# Altium PCB PCB.PcbDoc (part 1 of 9)
Units mil, origin at the board's own origin, x right, y up, seen from the top; angles counter-clockwise.
Board outline 4330.71 x 3149.61 mil, 8 copper layers (L1_TOP, L2_GND, L3_SIG, L4_PWR, L5_PWR, L6_SIG, L7_GND, L8_BOT), stack 62.406 mil thick; 660 components, 433 nets, 2602 pads, 1254 vias.
Unrouted connection lines stored in the file: 930.
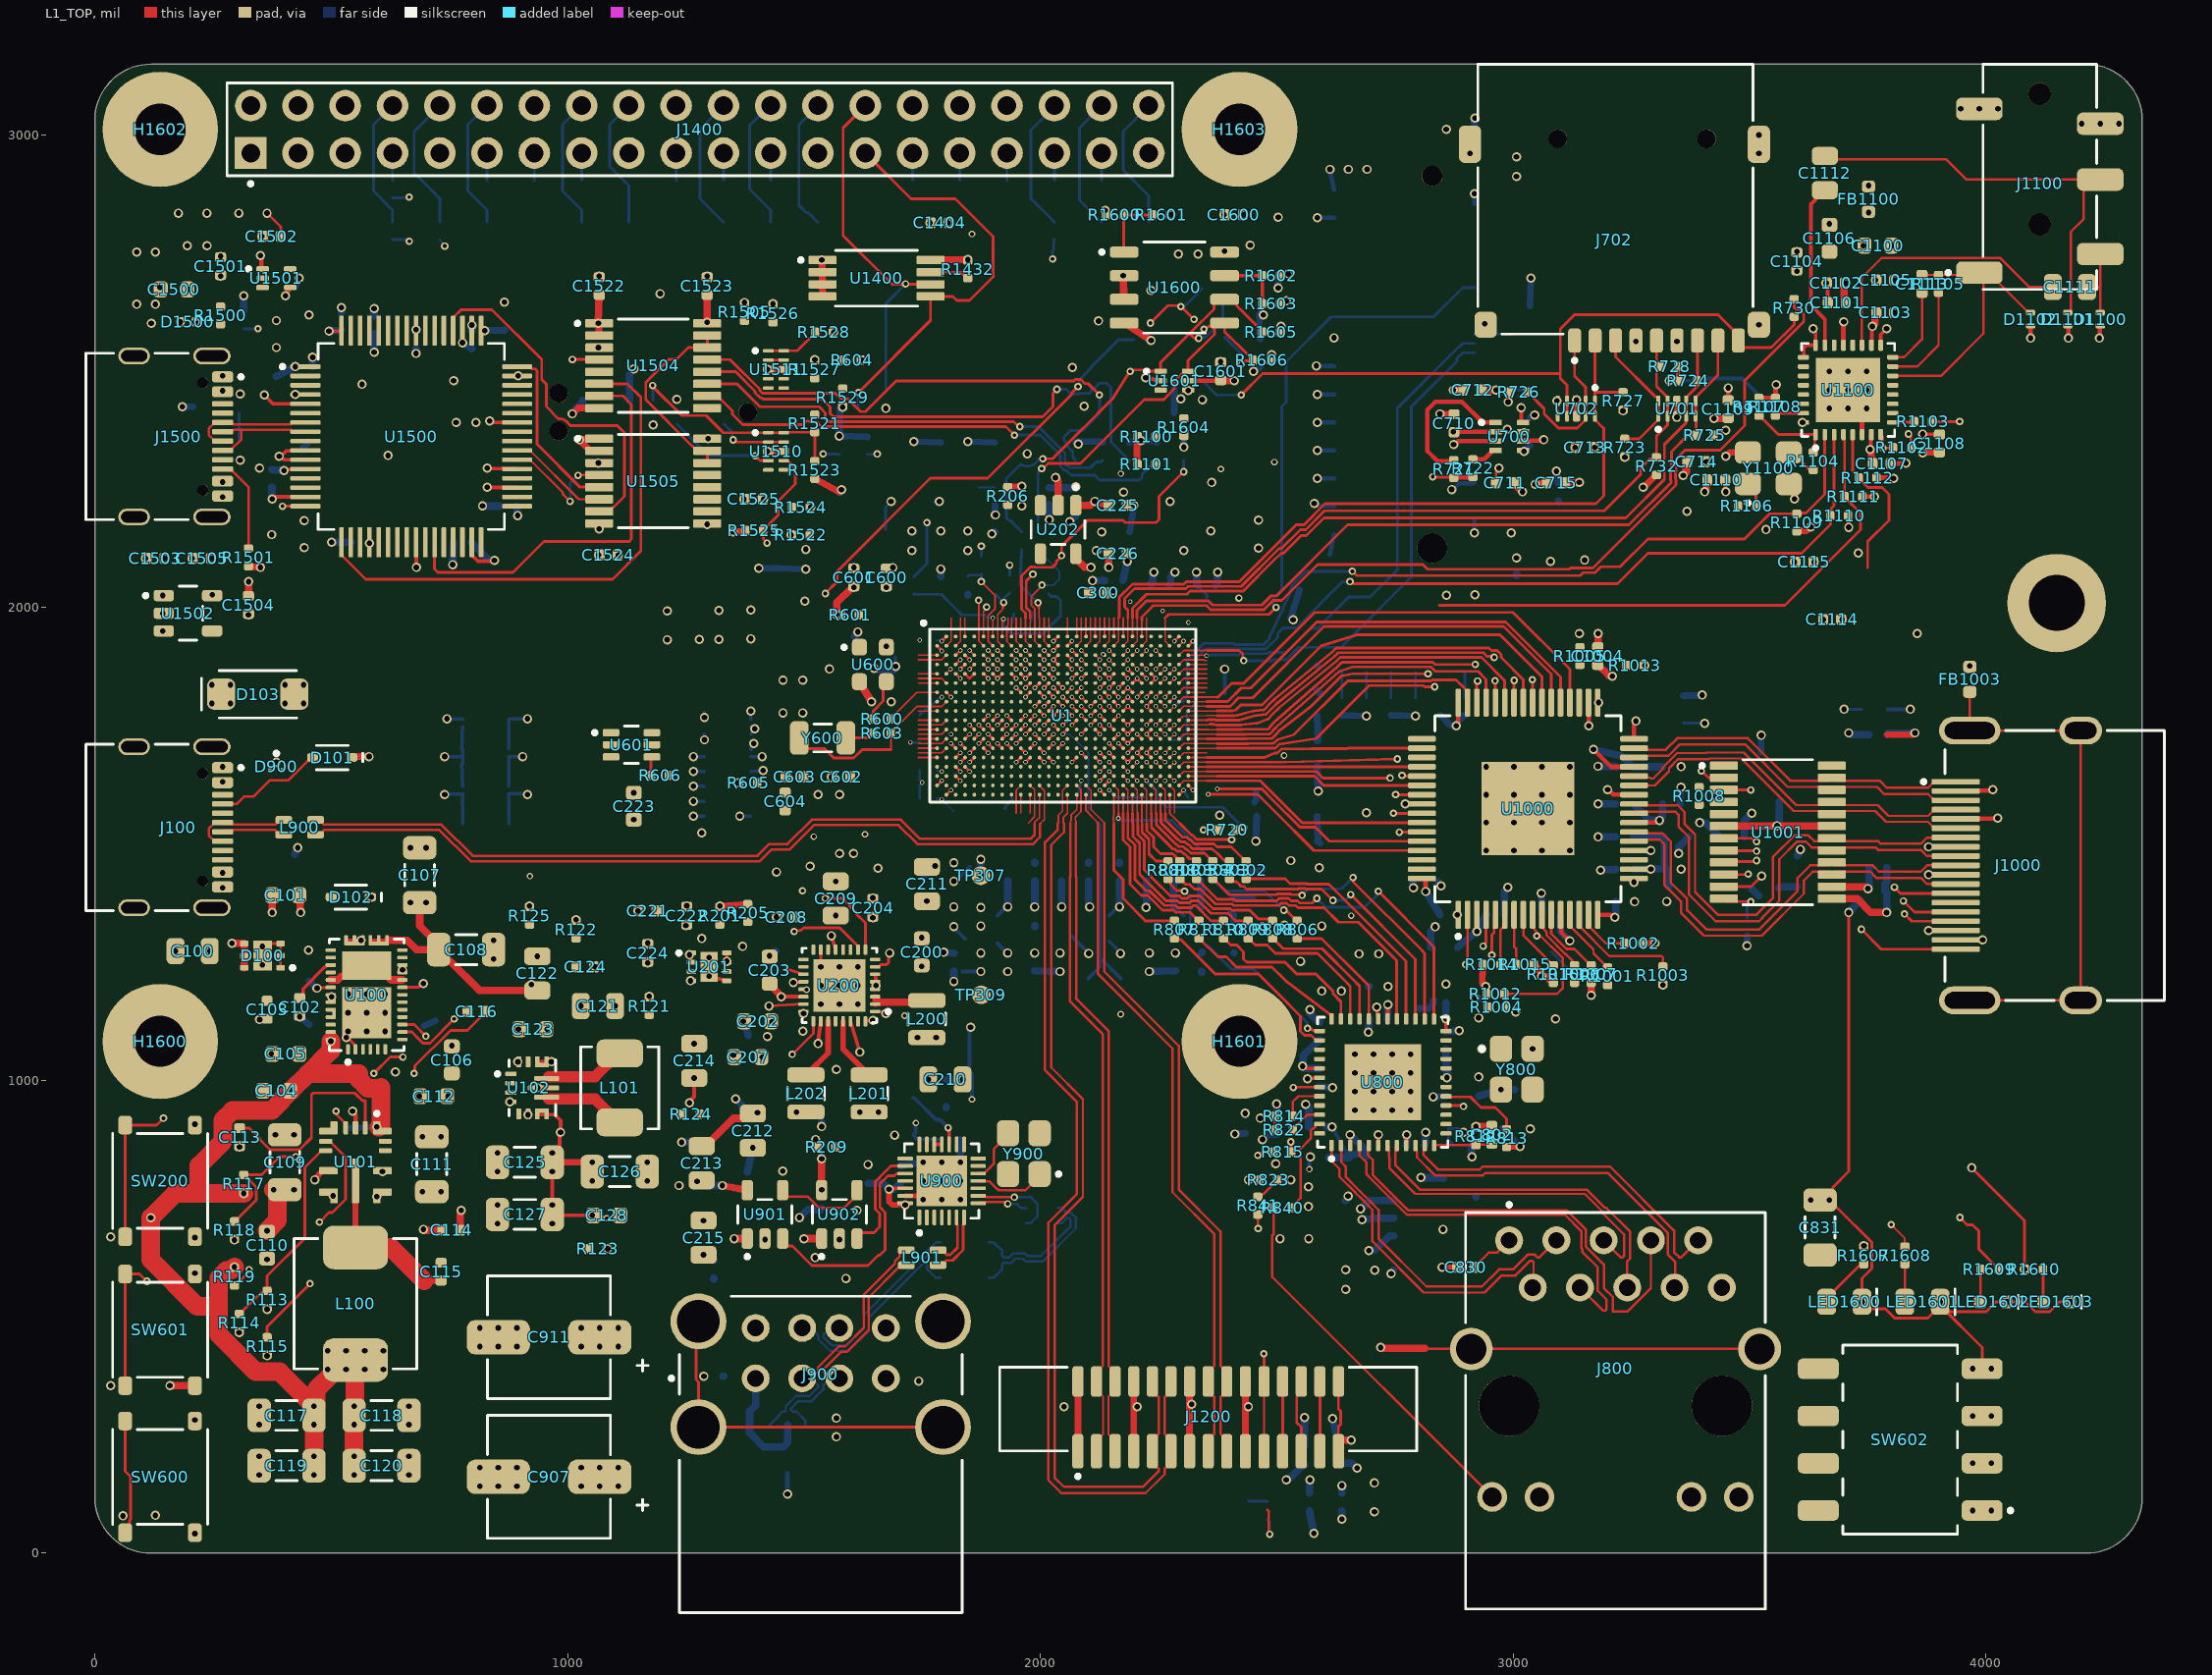
[diagram p0: L1_TOP view]
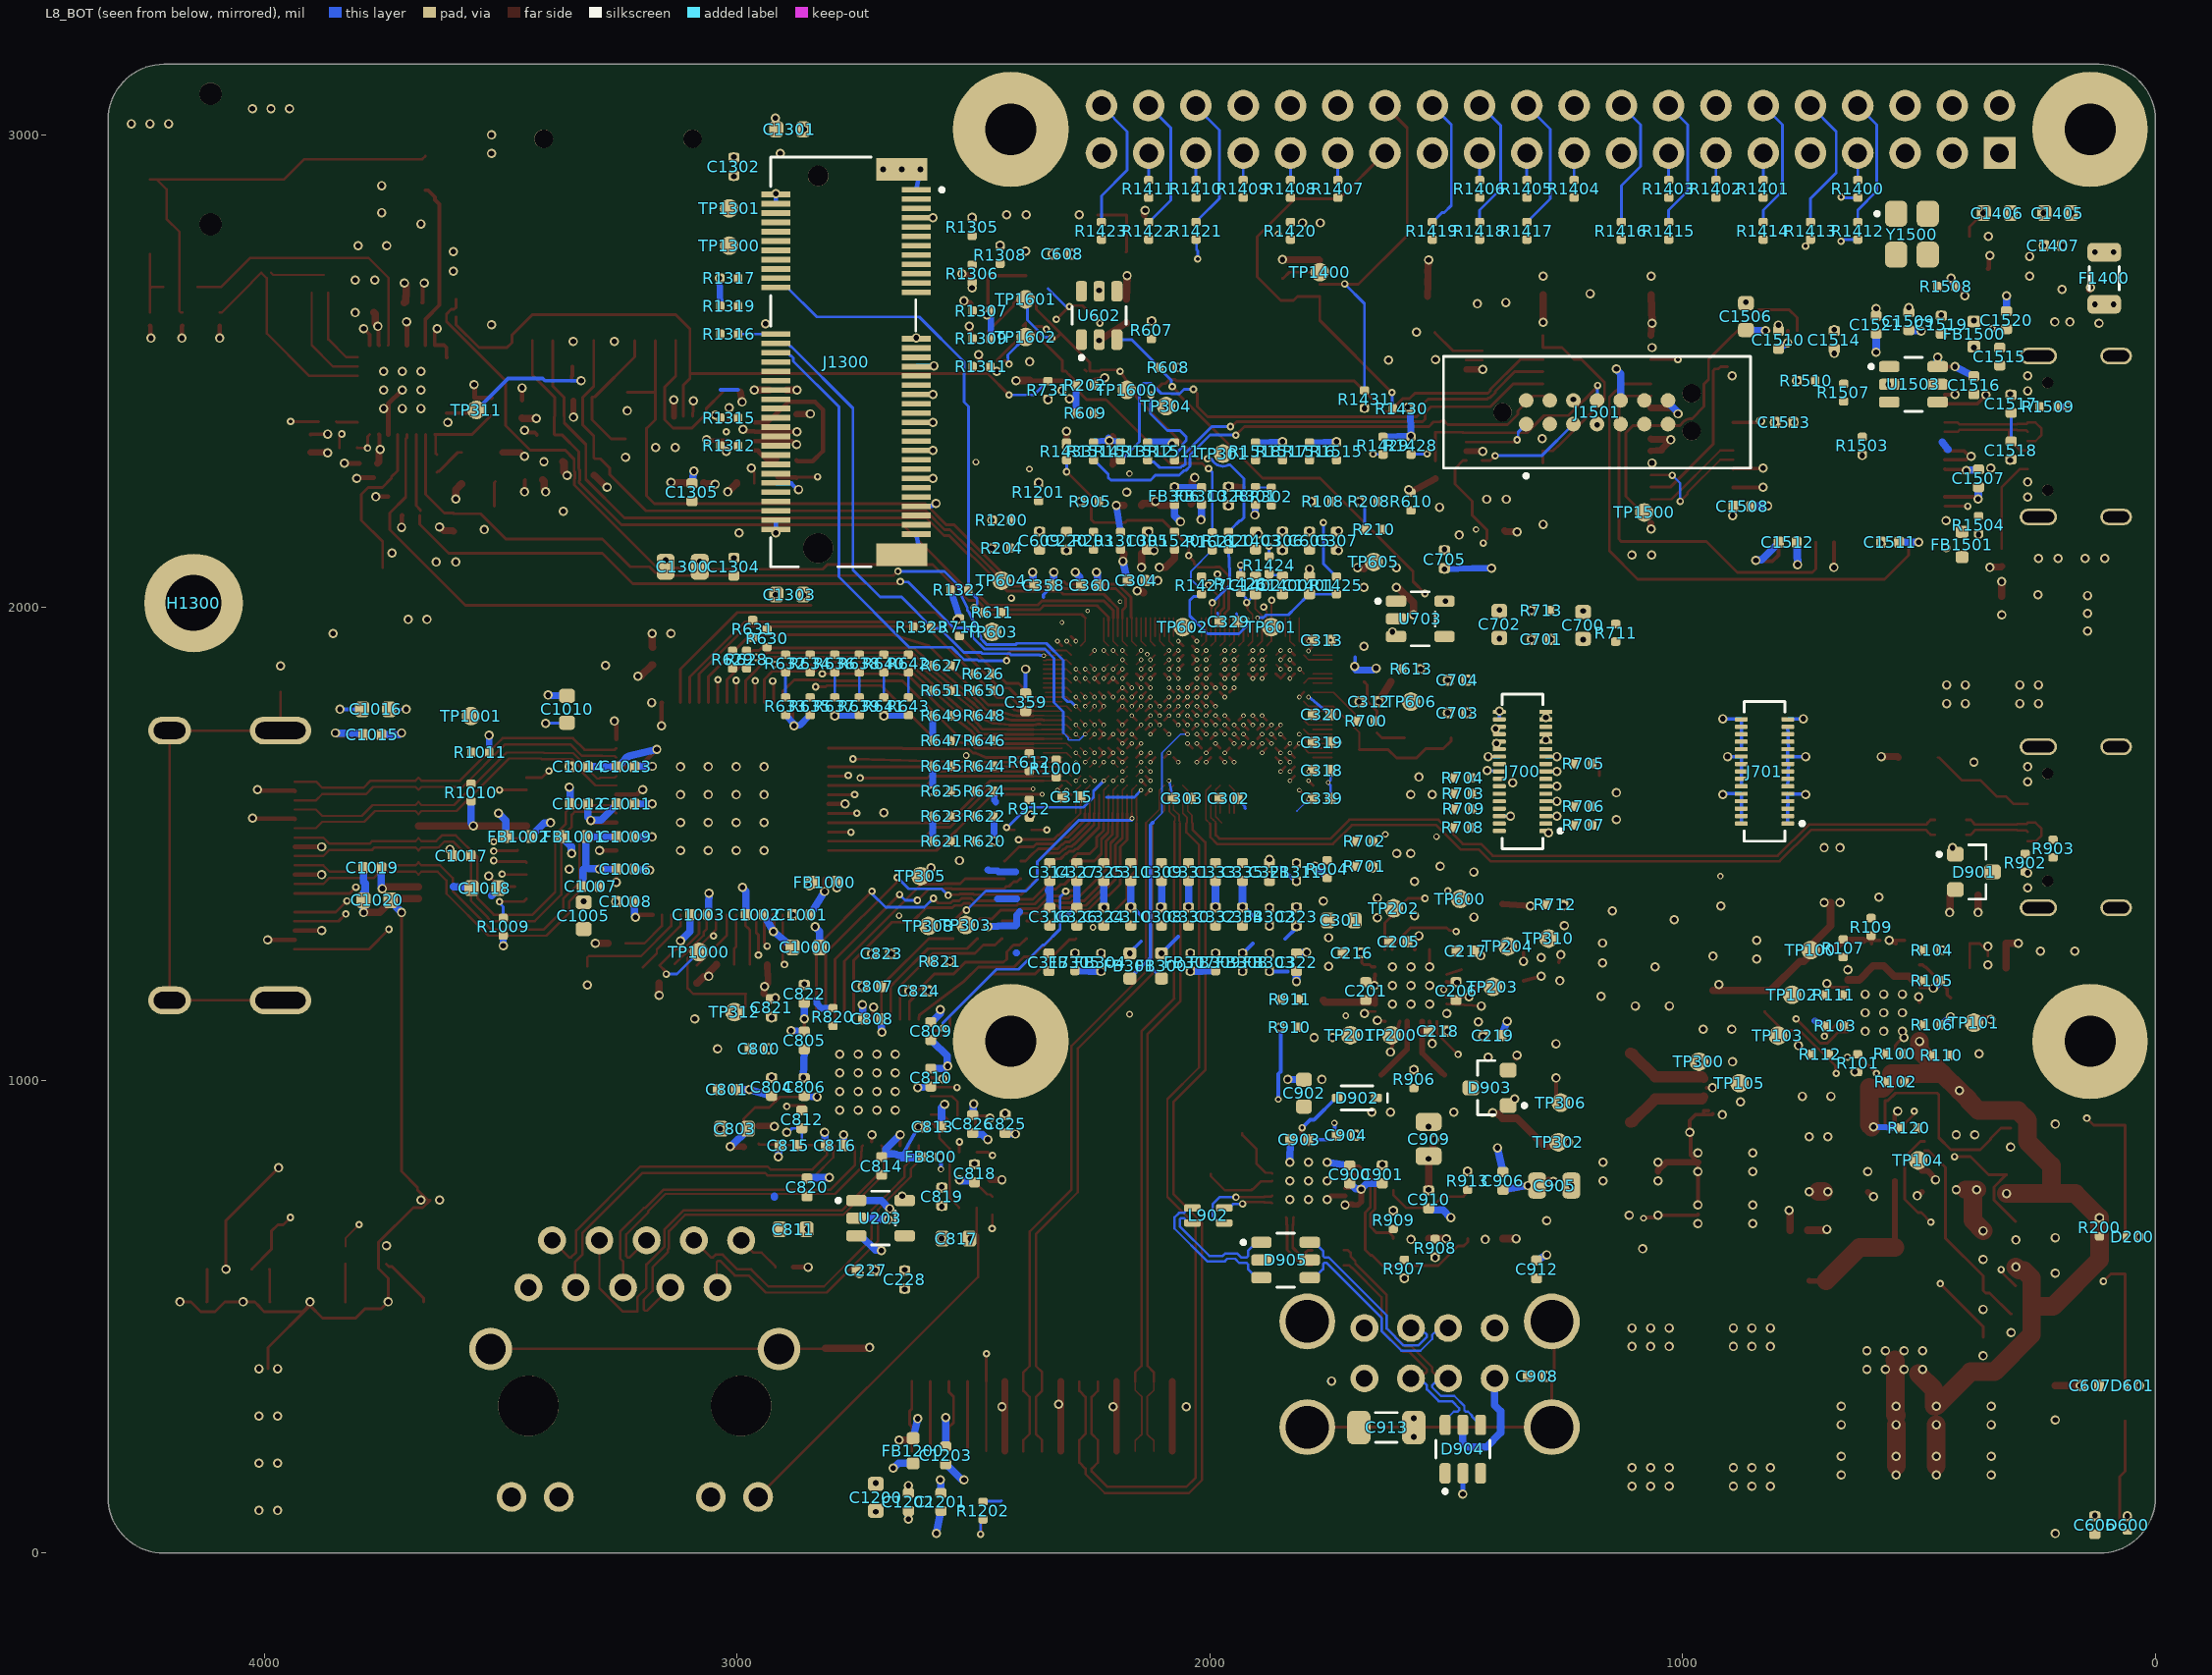
[diagram p1: L8_BOT view, seen from below]
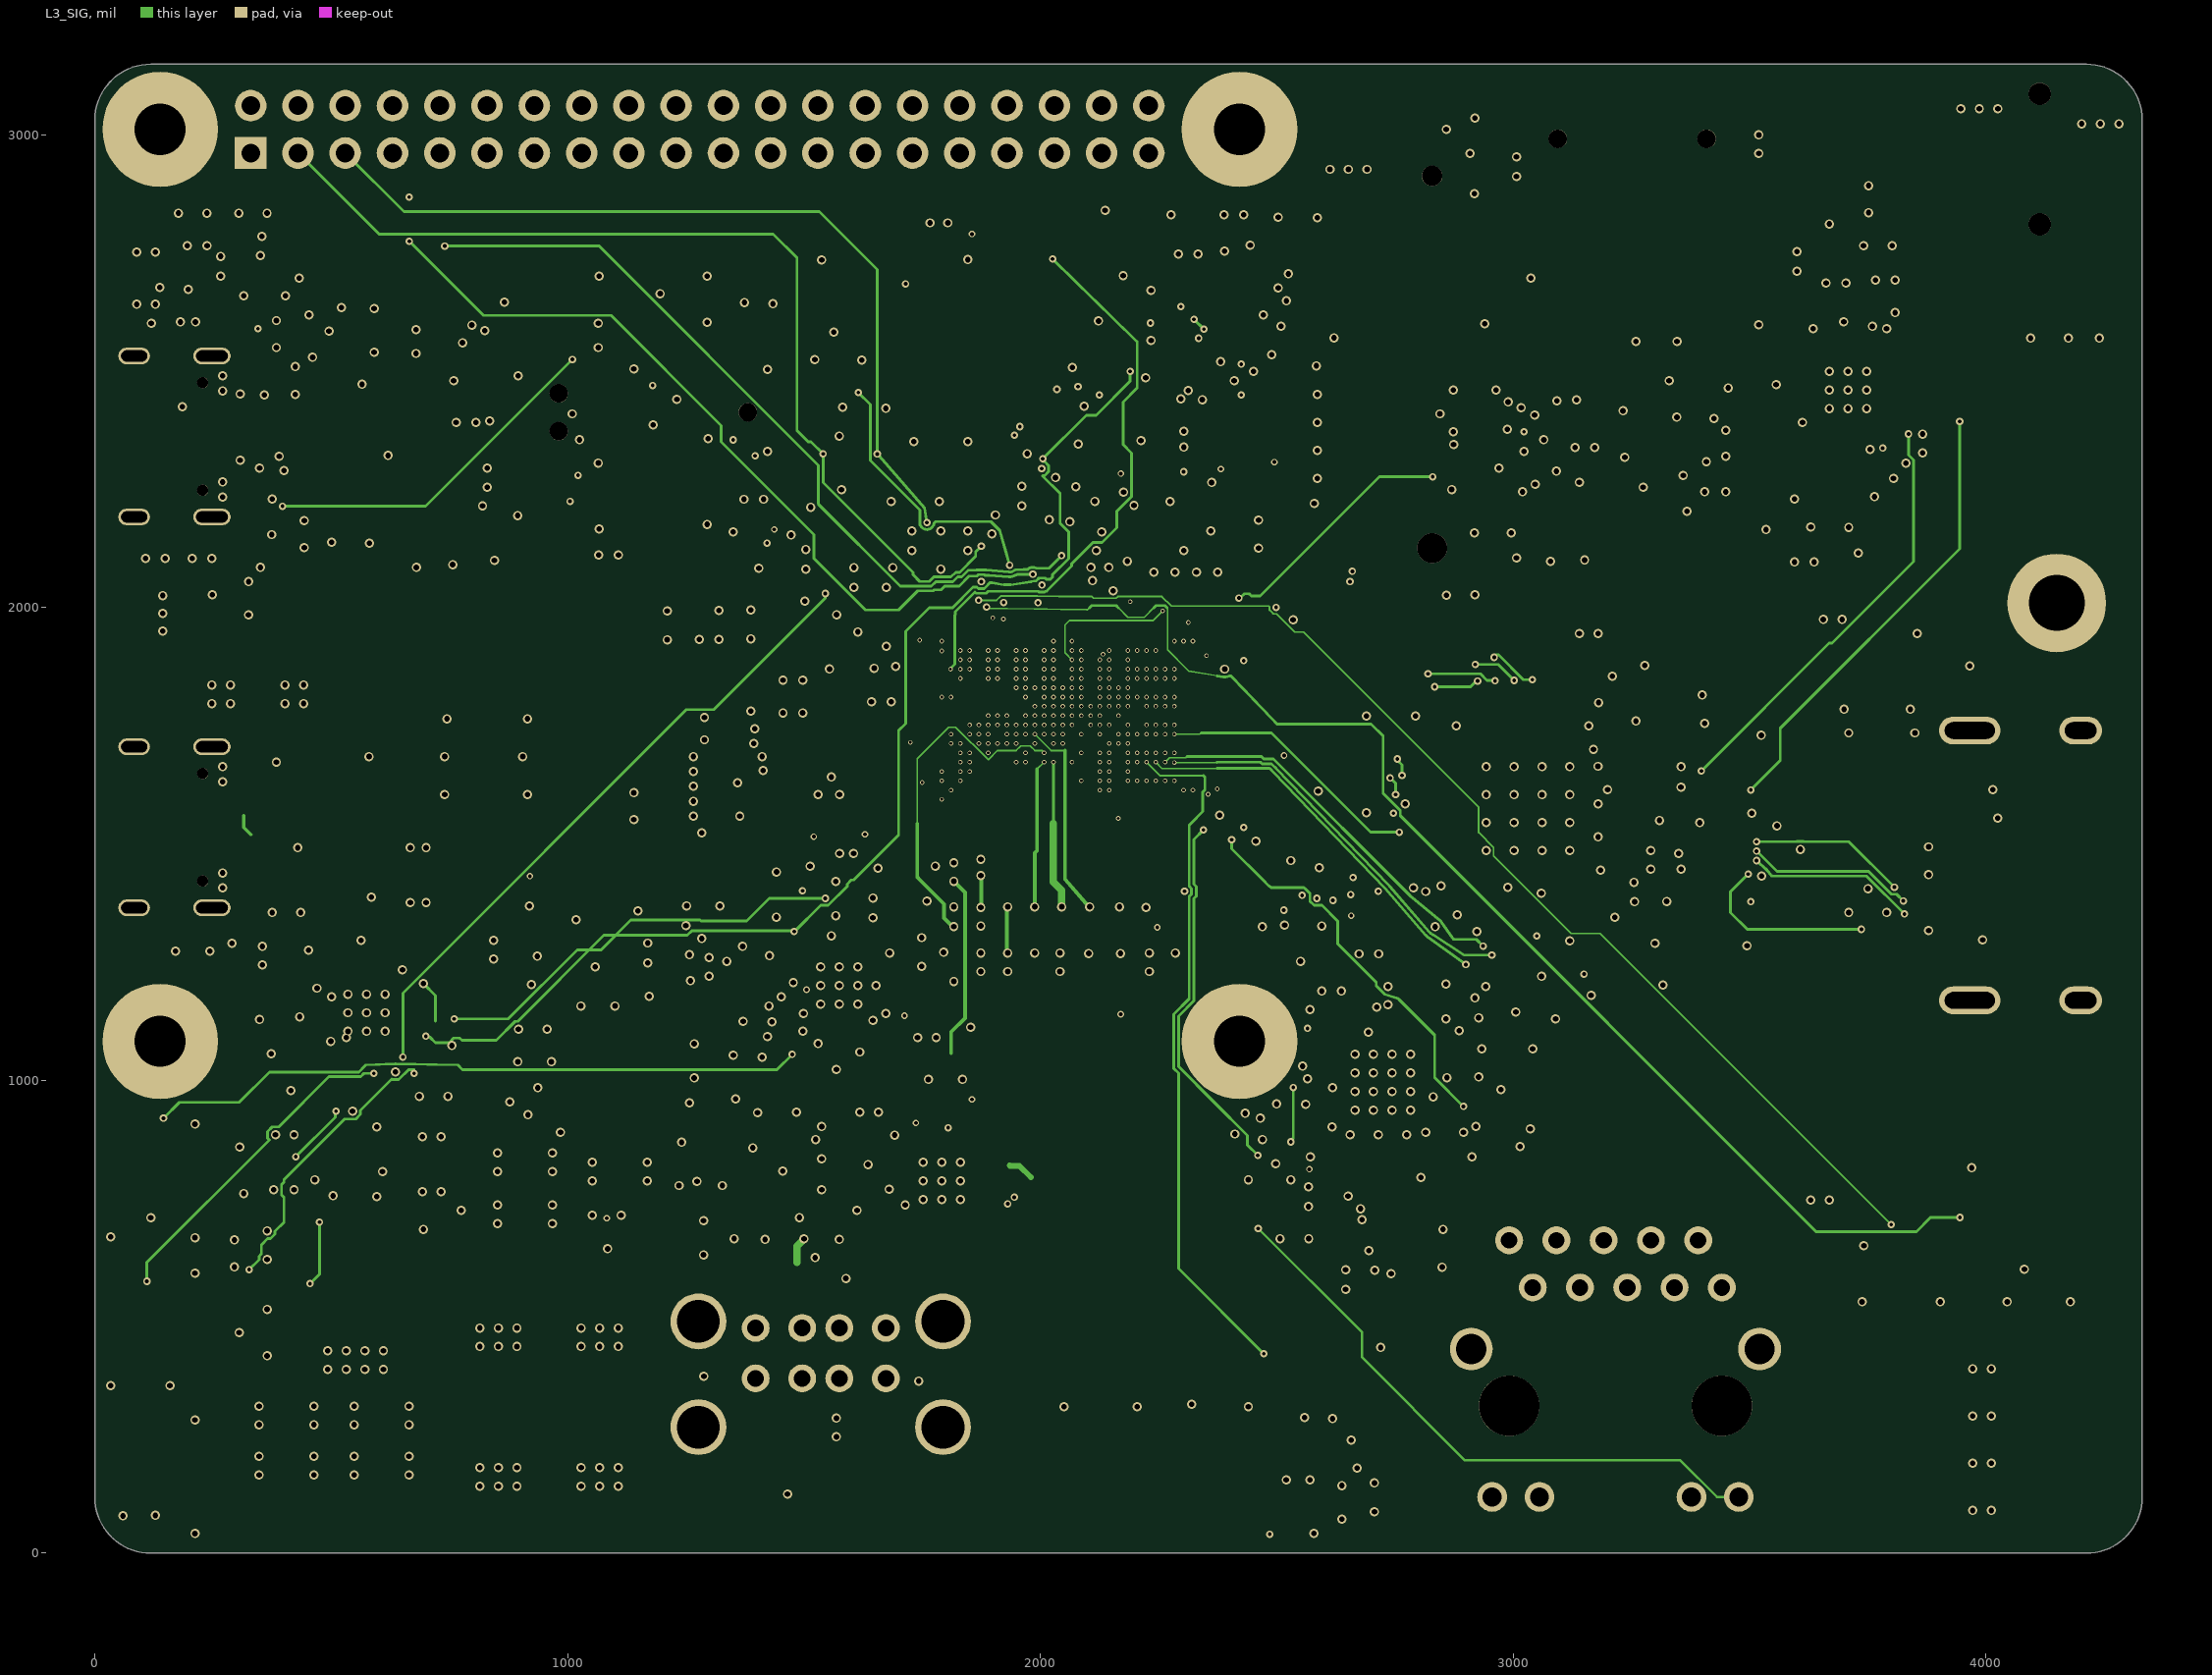
[diagram p2: L3_SIG]
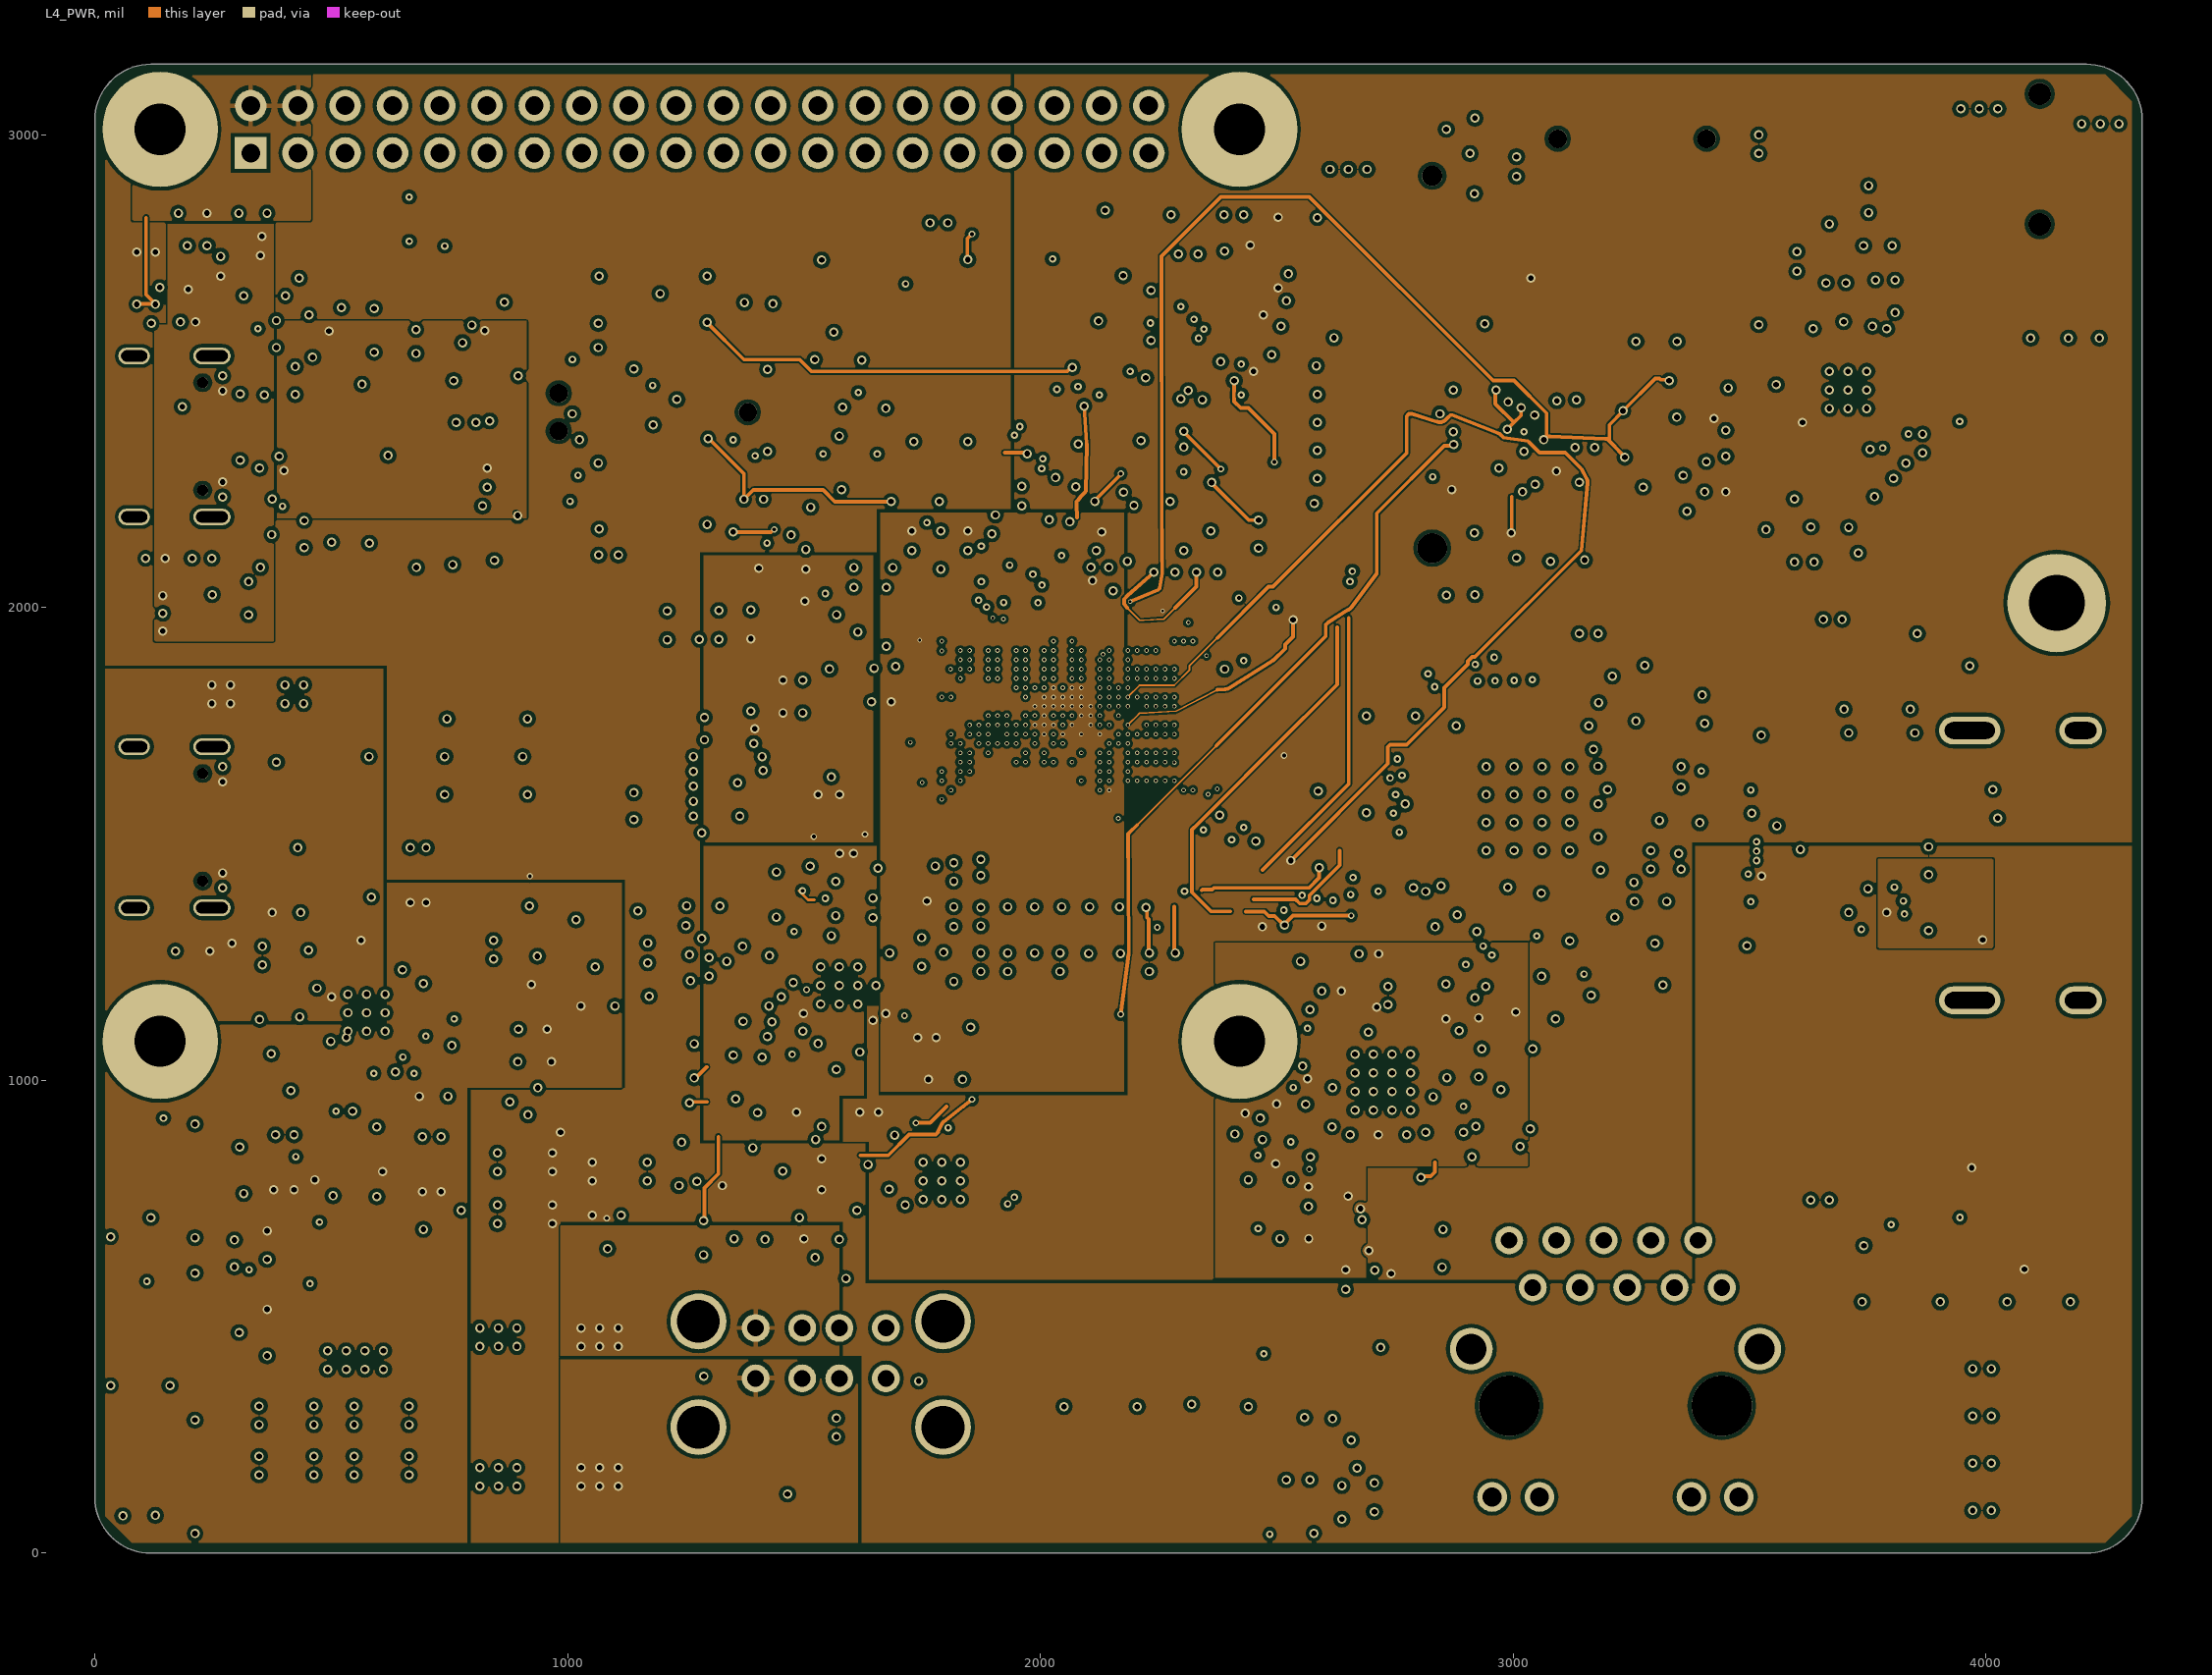
[diagram p3: L4_PWR]
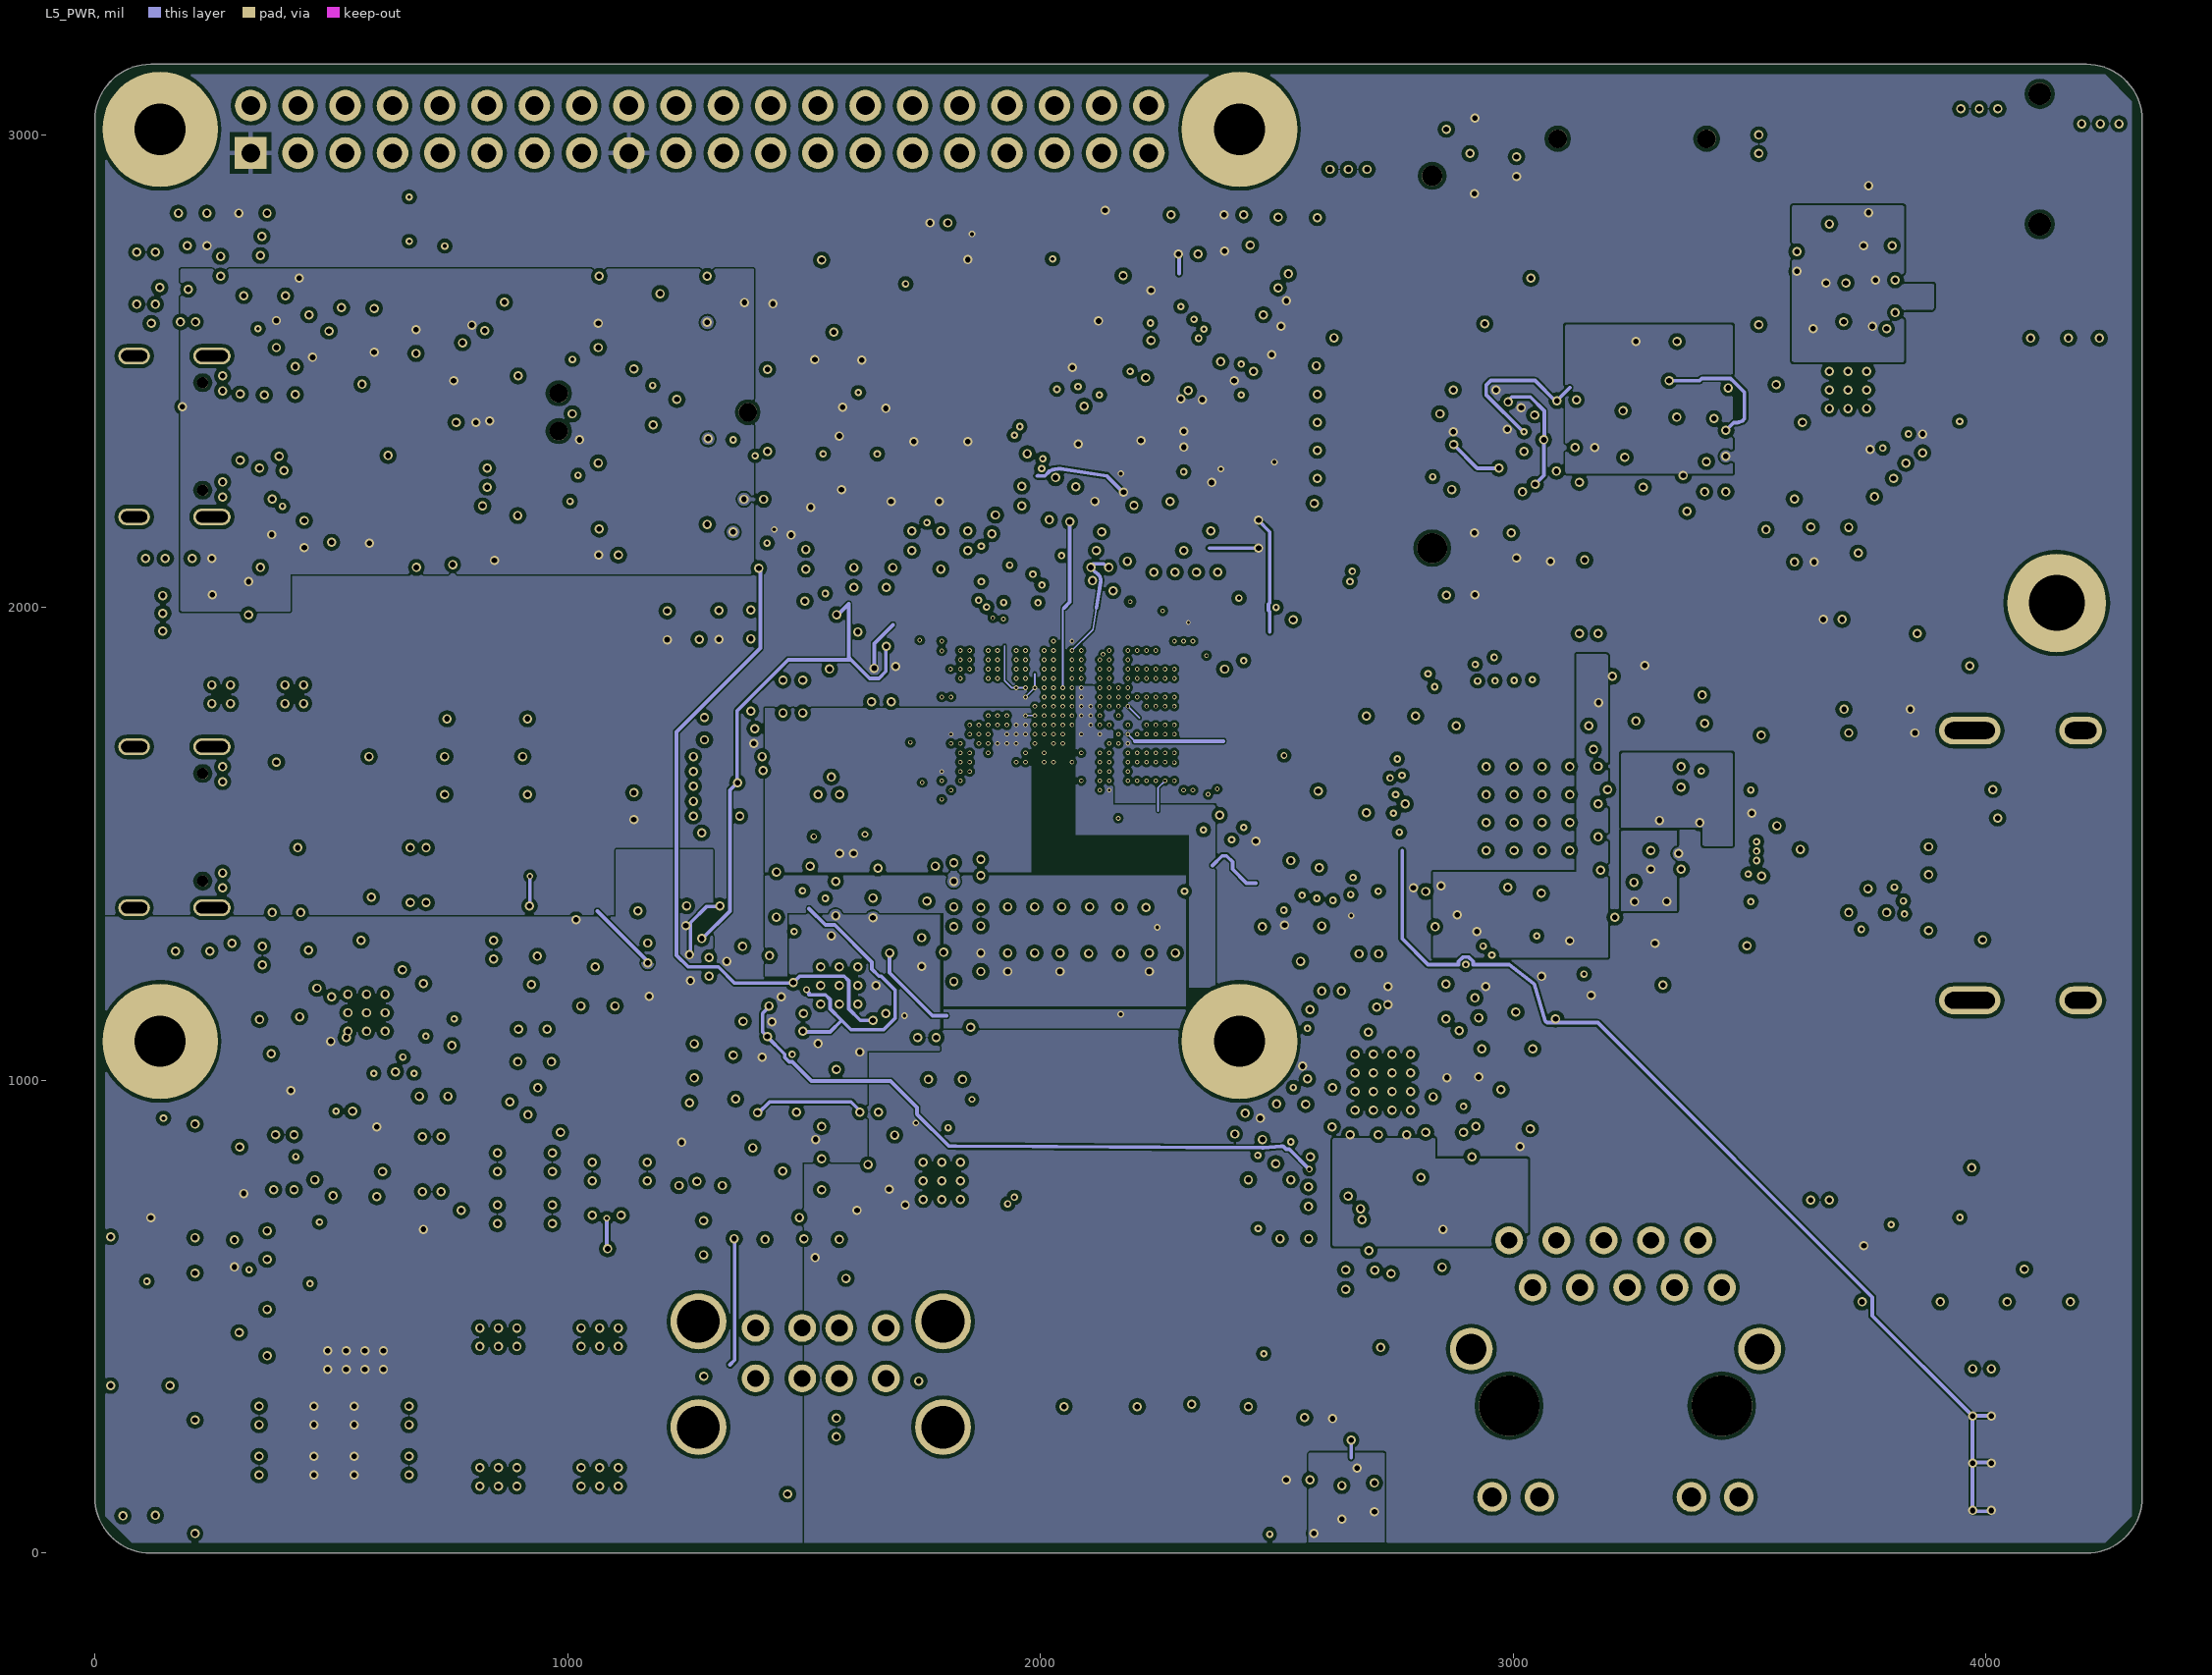
[diagram p4: L5_PWR]
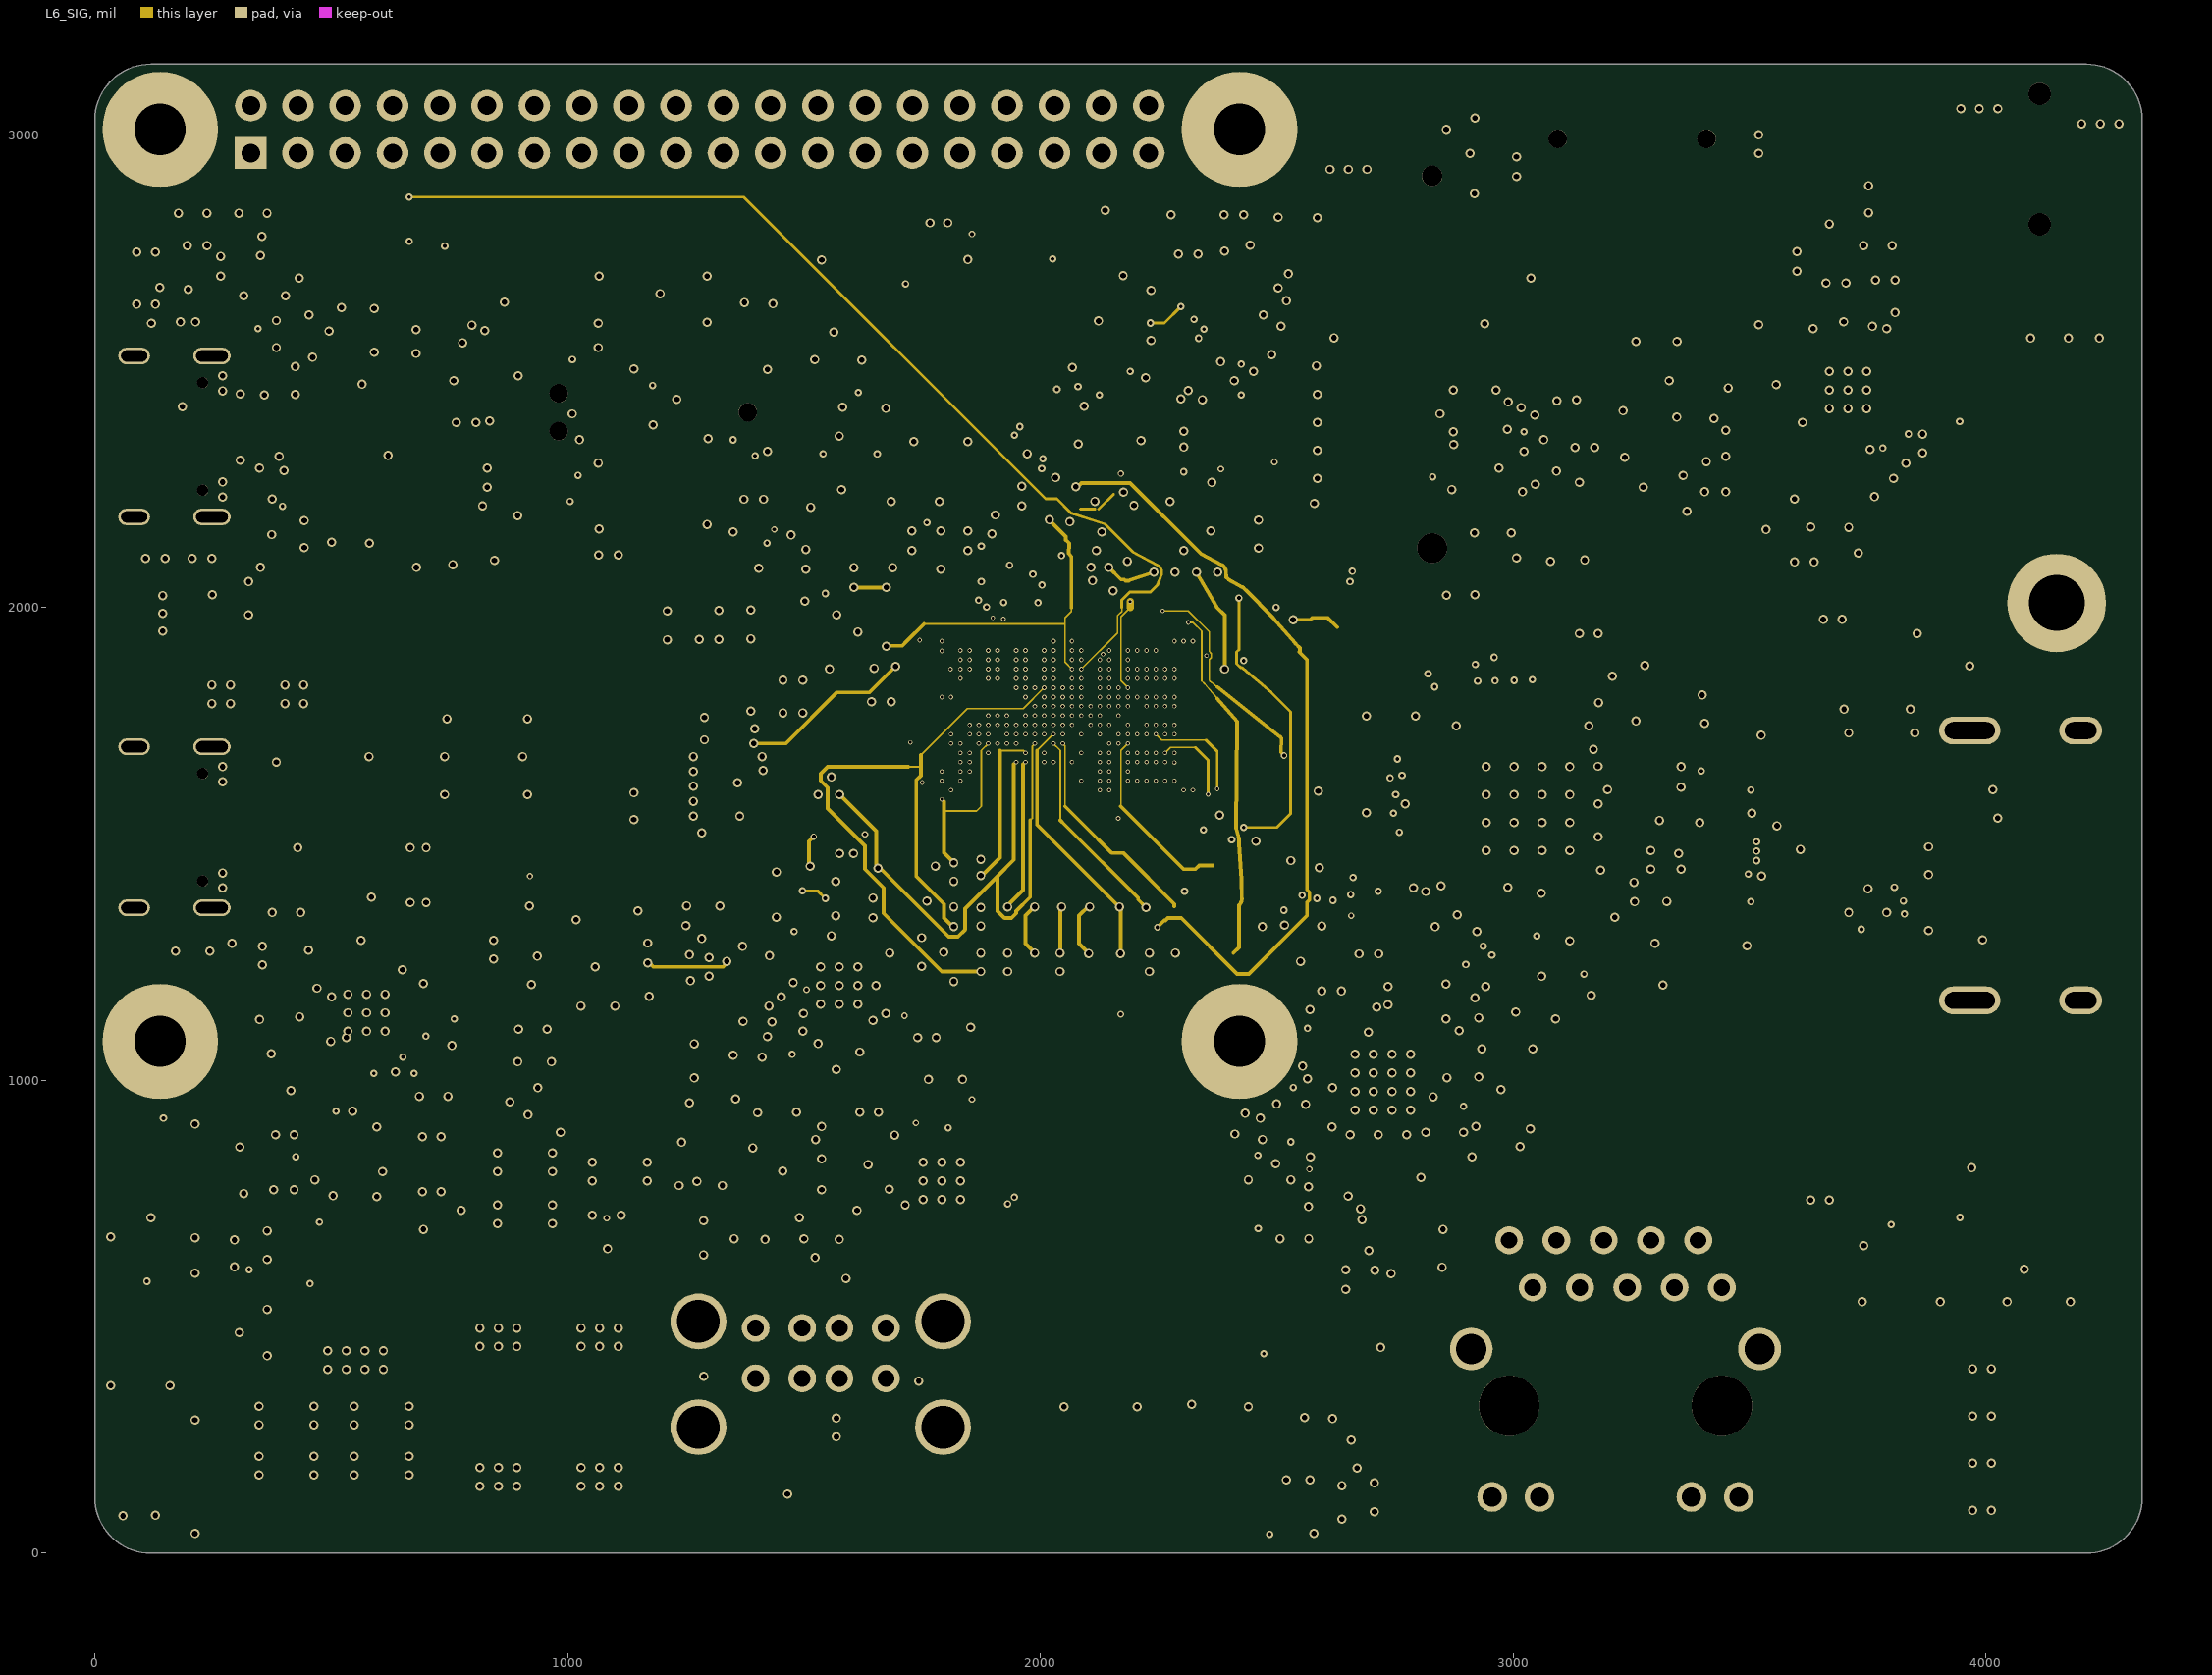
[diagram p5: L6_SIG]

## Layer stack, top to bottom
Top Solder: solder mask 1, Solder Resist, Dk 3.8
L1_TOP: signal copper 1.6
PP 3313 L1-L2: prepreg 3.9134, 3313 RC57%, Dk 4.3
L2_GND: signal copper 0.6
Core L2-L3: dielectric 3.937, FR-4 core H/H, Dk 4.3
L3_SIG: signal copper 0.6
PP 2116x3 L3-L4: prepreg 14.0472, 2116 RC54% x3, Dk 4.2
L4_PWR: signal copper 0.6
Core L4-L5: dielectric 11.811, FR-4 core H/H, Dk 4.3
L5_PWR: signal copper 0.6
PP 2116x3 L5-L6: prepreg 14.0472, 2116 RC54% x3, Dk 4.2
L6_SIG: signal copper 0.6
Core L6-L7: dielectric 3.937, FR-4 core H/H, Dk 4.3
L7_GND: signal copper 0.6
PP 3313 L7-L8: prepreg 3.9134, 3313 RC57%, Dk 4.3
L8_BOT: signal copper 1.6
Bottom Solder: solder mask 1, Solder Resist, Dk 3.8

## Board outline
118.11,0 4212.6,0 ccw(c4212.6,118.11) 4330.71,118.11 4330.71,3031.5 ccw(c4212.6,3031.5) 4212.6,3149.61 118.11,3149.61 ccw(c118.11,3031.5) 0,3031.5 0,118.11 ccw(c118.11,118.11)

## Design rules (kind name [scope] priority, off if disabled: settings)
BoardOutlineClearance Board_Outline [All] p1: gap=11.81 ignorepadtopadclearanceinfootprint=FALSE // APE-SBC setup (gen/pcbsetup.py)
Clearance Clr_InnerPour_SiPVia [InPolygon And (OnLayer('L2_GND') Or OnLayer('L4_PWR') Or OnLayer('L5_PWR') Or OnLayer('L7_GND')) vs IsVia And WithinRoom('U1_SiP')] p1: gap=5.91 ignorepadtopadclearanceinfootprint=FALSE // APE-SBC setup (gen/pcbsetup.py)
Clearance Clr_InnerPour_Hole [InPolygon And (OnLayer('L2_GND') Or OnLayer('L4_PWR') Or OnLayer('L5_PWR') Or OnLayer('L7_GND')) vs IsVia Or IsPad] p2: gap=7.87 ignorepadtopadclearanceinfootprint=FALSE // APE-SBC setup (gen/pcbsetup.py)
Clearance Clr_SiP [WithinRoom('U1_SiP')] p3: gap=3.54 ignorepadtopadclearanceinfootprint=FALSE // APE-SBC setup (gen/pcbsetup.py)
Clearance Clr_HS_Escape [WithinRoom('U1_Escape') And IsTrack vs IsTrack] p4: gap=3.94 ignorepadtopadclearanceinfootprint=FALSE // APE-SBC setup (gen/pcbsetup.py)
Clearance Clr_HDMI_Escape [WithinRoom('HDMI_Escape') And InDifferentialPairClass('HDMI_TMDS') And IsTrack vs IsTrack] p5: gap=3.94 ignorepadtopadclearanceinfootprint=FALSE // APE-SBC setup (gen/pcbsetup.py)
Clearance Clr_HDMI_Escape_Other [WithinRoom('HDMI_Escape') And IsTrack vs InDifferentialPairClass('HDMI_TMDS') And IsTrack] p6: gap=3.94 ignorepadtopadclearanceinfootprint=FALSE // APE-SBC setup (gen/pcbsetup.py)
Clearance Clr_ETH_Escape [WithinRoom('U800_Escape') And InDifferentialPairClass('ETH_MDI') And IsTrack vs IsTrack] p7: gap=3.94 ignorepadtopadclearanceinfootprint=FALSE // APE-SBC setup (gen/pcbsetup.py)
Clearance Clr_ETH_Escape_Other [WithinRoom('U800_Escape') And IsTrack vs InDifferentialPairClass('ETH_MDI') And IsTrack] p8: gap=3.94 ignorepadtopadclearanceinfootprint=FALSE // APE-SBC setup (gen/pcbsetup.py)
Clearance Clr_USBDBG_Escape [WithinRoom('J1500_Escape') And InDifferentialPairClass('USB_DBG') And IsTrack vs IsTrack] p9: gap=3.94 ignorepadtopadclearanceinfootprint=FALSE // APE-SBC setup (gen/pcbsetup.py)
Clearance Clr_USBDBG_Escape_Other [WithinRoom('J1500_Escape') And IsTrack vs InDifferentialPairClass('USB_DBG') And IsTrack] p10: gap=3.94 ignorepadtopadclearanceinfootprint=FALSE // APE-SBC setup (gen/pcbsetup.py)
Clearance Clr_USB1_Escape [WithinRoom('U900_Escape') And InDifferentialPairClass('USB1') And IsTrack vs IsTrack] p11: gap=3.94 ignorepadtopadclearanceinfootprint=FALSE // APE-SBC setup (gen/pcbsetup.py)
Clearance Clr_USB1_Escape_Other [WithinRoom('U900_Escape') And IsTrack vs InDifferentialPairClass('USB1') And IsTrack] p12: gap=3.94 ignorepadtopadclearanceinfootprint=FALSE // APE-SBC setup (gen/pcbsetup.py)
Clearance Clr_HS_DP_Periodic [InNetClass('HS_CLK') And IsTrack vs (InDifferentialPairClass('USB0') Or InDifferentialPairClass('USB1') Or InDifferentialPairClass('USB_DBG') Or InDifferentialPairClass('ETH_MDI') Or InDifferentialPairClass('HDMI_TMDS') Or InDifferentialPairClass('CSI')) And IsTrack] p13: gap=50 ignorepadtopadclearanceinfootprint=FALSE // APE-SBC setup (gen/pcbsetup.py)
Clearance Clr_HS_USB0 [InDifferentialPair('USB0') And IsTrack vs (Not InDifferentialPair('USB0')) And IsTrack And (Not InNet('GND'))] p14: gap=30 ignorepadtopadclearanceinfootprint=FALSE // APE-SBC setup (gen/pcbsetup.py)
Clearance Clr_HS_USBC1 [InDifferentialPair('USBC1') And IsTrack vs (Not InDifferentialPair('USBC1')) And IsTrack And (Not InNet('GND'))] p15: gap=30 ignorepadtopadclearanceinfootprint=FALSE // APE-SBC setup (gen/pcbsetup.py)
Clearance Clr_HS_USB1 [InDifferentialPair('USB1') And IsTrack vs (Not InDifferentialPair('USB1')) And IsTrack And (Not InNet('GND'))] p16: gap=30 ignorepadtopadclearanceinfootprint=FALSE // APE-SBC setup (gen/pcbsetup.py)
Clearance Clr_HS_HUB_P1 [InDifferentialPair('HUB_P1') And IsTrack vs (Not InDifferentialPair('HUB_P1')) And IsTrack And (Not InNet('GND'))] p17: gap=30 ignorepadtopadclearanceinfootprint=FALSE // APE-SBC setup (gen/pcbsetup.py)
Clearance Clr_HS_HUB_P2 [InDifferentialPair('HUB_P2') And IsTrack vs (Not InDifferentialPair('HUB_P2')) And IsTrack And (Not InNet('GND'))] p18: gap=30 ignorepadtopadclearanceinfootprint=FALSE // APE-SBC setup (gen/pcbsetup.py)
Clearance Clr_HS_USBA1 [InDifferentialPair('USBA1') And IsTrack vs (Not InDifferentialPair('USBA1')) And IsTrack And (Not InNet('GND'))] p19: gap=30 ignorepadtopadclearanceinfootprint=FALSE // APE-SBC setup (gen/pcbsetup.py)
Clearance Clr_HS_USBA2 [InDifferentialPair('USBA2') And IsTrack vs (Not InDifferentialPair('USBA2')) And IsTrack And (Not InNet('GND'))] p20: gap=30 ignorepadtopadclearanceinfootprint=FALSE // APE-SBC setup (gen/pcbsetup.py)
Clearance Clr_HS_DBG_USB [InDifferentialPair('DBG_USB') And IsTrack vs (Not InDifferentialPair('DBG_USB')) And IsTrack And (Not InNet('GND'))] p21: gap=30 ignorepadtopadclearanceinfootprint=FALSE // APE-SBC setup (gen/pcbsetup.py)
Clearance Clr_HS_ETH_MDI0 [InDifferentialPair('ETH_MDI0') And IsTrack vs (Not InDifferentialPair('ETH_MDI0')) And IsTrack And (Not InNet('GND'))] p22: gap=30 ignorepadtopadclearanceinfootprint=FALSE // APE-SBC setup (gen/pcbsetup.py)
Clearance Clr_HS_ETH_MDI1 [InDifferentialPair('ETH_MDI1') And IsTrack vs (Not InDifferentialPair('ETH_MDI1')) And IsTrack And (Not InNet('GND'))] p23: gap=30 ignorepadtopadclearanceinfootprint=FALSE // APE-SBC setup (gen/pcbsetup.py)
Clearance Clr_HS_ETH_MDI2 [InDifferentialPair('ETH_MDI2') And IsTrack vs (Not InDifferentialPair('ETH_MDI2')) And IsTrack And (Not InNet('GND'))] p24: gap=30 ignorepadtopadclearanceinfootprint=FALSE // APE-SBC setup (gen/pcbsetup.py)
Clearance Clr_HS_ETH_MDI3 [InDifferentialPair('ETH_MDI3') And IsTrack vs (Not InDifferentialPair('ETH_MDI3')) And IsTrack And (Not InNet('GND'))] p25: gap=30 ignorepadtopadclearanceinfootprint=FALSE // APE-SBC setup (gen/pcbsetup.py)
Clearance Clr_HS_HDMI_TX0 [InDifferentialPair('HDMI_TX0') And IsTrack vs (Not InDifferentialPair('HDMI_TX0')) And IsTrack And (Not InNet('GND'))] p26: gap=30 ignorepadtopadclearanceinfootprint=FALSE // APE-SBC setup (gen/pcbsetup.py)
Clearance Clr_HS_HDMI_TX1 [InDifferentialPair('HDMI_TX1') And IsTrack vs (Not InDifferentialPair('HDMI_TX1')) And IsTrack And (Not InNet('GND'))] p27: gap=30 ignorepadtopadclearanceinfootprint=FALSE // APE-SBC setup (gen/pcbsetup.py)
Clearance Clr_HS_HDMI_TX2 [InDifferentialPair('HDMI_TX2') And IsTrack vs (Not InDifferentialPair('HDMI_TX2')) And IsTrack And (Not InNet('GND'))] p28: gap=30 ignorepadtopadclearanceinfootprint=FALSE // APE-SBC setup (gen/pcbsetup.py)
Clearance Clr_HS_HDMI_TXC [InDifferentialPair('HDMI_TXC') And IsTrack vs (Not InDifferentialPair('HDMI_TXC')) And IsTrack And (Not InNet('GND'))] p29: gap=30 ignorepadtopadclearanceinfootprint=FALSE // APE-SBC setup (gen/pcbsetup.py)
Clearance Clr_HS_CSI_CLK [InDifferentialPair('CSI_CLK') And IsTrack vs (Not InDifferentialPair('CSI_CLK')) And IsTrack And (Not InNet('GND'))] p30: gap=30 ignorepadtopadclearanceinfootprint=FALSE // APE-SBC setup (gen/pcbsetup.py)
Clearance Clr_HS_CSI_D0 [InDifferentialPair('CSI_D0') And IsTrack vs (Not InDifferentialPair('CSI_D0')) And IsTrack And (Not InNet('GND'))] p31: gap=30 ignorepadtopadclearanceinfootprint=FALSE // APE-SBC setup (gen/pcbsetup.py)
Clearance Clr_HS_CSI_D1 [InDifferentialPair('CSI_D1') And IsTrack vs (Not InDifferentialPair('CSI_D1')) And IsTrack And (Not InNet('GND'))] p32: gap=30 ignorepadtopadclearanceinfootprint=FALSE // APE-SBC setup (gen/pcbsetup.py)
Clearance Clr_SMD_SMD [IsSMTPin vs IsSMTPin] p33: gap=5.91 ignorepadtopadclearanceinfootprint=FALSE // APE-SBC setup (gen/pcbsetup.py)
Clearance Clr_Default [All] p34: gap=3.94 ignorepadtopadclearanceinfootprint=FALSE // APE-SBC setup (gen/pcbsetup.py)
DiffPairsRouting DP_90R_USB [InDifferentialPairClass('USB0') Or InDifferentialPairClass('USB1') Or InDifferentialPairClass('USB_DBG')] p1: maxlimit=7.87 minlimit=3.54 mostfreqgap=6 toplayer_minwidth=3.54 toplayer_maxwidth=5.91 toplayer_prefwidth=5.34 midlayer2_minwidth=3.54 midlayer2_maxwidth=5.91 midlayer2_prefwidth=4.65 midlayer5_minwidth=3.54 midlayer5_maxwidth=5.91 midlayer5_prefwidth=4.65 bottomlayer_minwidth=3.54 bottomlayer_maxwidth=5.91 bottomlayer_prefwidth=5.34 impedanceprofiledriven=TRUE impedanceprofileid={7402E617-EB0B-4D09-935C-4EA56E4E449E} impedanceprofilevalue=90.000000 maxuncoupledlength=196.85 // APE-SBC setup (gen/pcbsetup.py)
DiffPairsRouting DP_100R_TMDS [InDifferentialPairClass('HDMI_TMDS')] p2: maxlimit=9.84 minlimit=3.54 mostfreqgap=8 toplayer_minwidth=4.69 toplayer_maxwidth=4.69 toplayer_prefwidth=4.69 midlayer1_minwidth=4.69 midlayer1_maxwidth=4.69 midlayer1_prefwidth=4.69 midlayer2_minwidth=4.69 midlayer2_maxwidth=4.69 midlayer2_prefwidth=4.69 midlayer3_minwidth=4.69 midlayer3_maxwidth=4.69 midlayer3_prefwidth=4.69 midlayer4_minwidth=4.69 midlayer4_maxwidth=4.69 midlayer4_prefwidth=4.69 midlayer5_minwidth=4.69 midlayer5_maxwidth=4.69 midlayer5_prefwidth=4.69 midlayer6_minwidth=4.69 midlayer6_maxwidth=4.69 midlayer6_prefwidth=4.69 bottomlayer_minwidth=4.69 bottomlayer_maxwidth=4.69 bottomlayer_prefwidth=4.69 maxuncoupledlength=196.85 // APE-SBC setup (gen/pcbsetup.py)
DiffPairsRouting DP_100R [InDifferentialPairClass('ETH_MDI') Or InDifferentialPairClass('HDMI_TMDS') Or InDifferentialPairClass('CSI')] p3: maxlimit=9.84 minlimit=3.54 mostfreqgap=8 toplayer_minwidth=3.54 toplayer_maxwidth=5.12 toplayer_prefwidth=4.69 midlayer2_minwidth=3.54 midlayer2_maxwidth=5.12 midlayer2_prefwidth=4.01 midlayer5_minwidth=3.54 midlayer5_maxwidth=5.12 midlayer5_prefwidth=4.01 bottomlayer_minwidth=3.54 bottomlayer_maxwidth=5.12 bottomlayer_prefwidth=4.69 impedanceprofiledriven=TRUE impedanceprofileid={0371FD84-AD0E-46D5-B686-1FE8D4CF1FC4} impedanceprofilevalue=100.000000 maxuncoupledlength=196.85 // APE-SBC setup (gen/pcbsetup.py)
HoleSize Hole_Size [All] p1: absolutevalues=TRUE maxlimit=248.03 minlimit=5.91 maxpercent=80.000 minpercent=20.000 // APE-SBC setup (gen/pcbsetup.py)
HoleToHoleClearance HoleToHole_Pads [IsPad vs IsPad] p1: gap=17.72 allowstackedmicrovias=TRUE // APE-SBC setup (gen/pcbsetup.py)
HoleToHoleClearance HoleToHole [All] p2: gap=7.87 allowstackedmicrovias=TRUE // APE-SBC setup (gen/pcbsetup.py)
Length L_RGMII [InxSignalClass('RGMII_TX') Or InxSignalClass('RGMII_RX')] p1: maxlimit=2000 minlimit=0 // APE-SBC setup (gen/pcbsetup.py)
Length L_MMC0 [InxSignalClass('MMC0')] p2: maxlimit=1574.8 minlimit=419.52 // APE-SBC setup (gen/pcbsetup.py)
Length L_MMC1 [InxSignalClass('MMC1')] p3: maxlimit=7931.24 minlimit=813.22 // APE-SBC setup (gen/pcbsetup.py)
Length L_MMC2 [InxSignalClass('MMC2')] p4: maxlimit=7931.24 minlimit=0 // APE-SBC setup (gen/pcbsetup.py)
Length L_DPI [InxSignalClass('DPI')] p5: maxlimit=2800 minlimit=0 // APE-SBC setup (gen/pcbsetup.py)
Length L_MCASP [InNetClass('HS_MCASP')] p6: maxlimit=6294.63 minlimit=645.41 // APE-SBC setup (gen/pcbsetup.py)
Length L_USB [(InDifferentialPairClass('USB0') Or InDifferentialPairClass('USB1') Or InDifferentialPairClass('USB_DBG'))] p7: maxlimit=12000 minlimit=0 // APE-SBC setup (gen/pcbsetup.py)
Length L_CSI [InDifferentialPairClass('CSI')] p8: maxlimit=10000 minlimit=0 // APE-SBC setup (gen/pcbsetup.py)
Length L_TMDS [InDifferentialPairClass('HDMI_TMDS')] p9: maxlimit=2000 minlimit=0 // APE-SBC setup (gen/pcbsetup.py)
MatchedLengths M_RGMII_TXD [InxSignal('ETH_TD0-PHY_TX_D0_PP1') Or InxSignal('ETH_TD1-PHY_TX_D1_PP1') Or InxSignal('ETH_TD2-PHY_TX_D2_PP1') Or InxSignal('ETH_TD3-PHY_TX_D3_PP1')] p1: tolerance=60 checknetsindiffpair=FALSE checkdiffpairvsdiffpair=TRUE checkxsignals=TRUE checkothers=TRUE // APE-SBC setup (gen/pcbsetup.py)
MatchedLengths M_RGMII_RXD [InxSignal('ETH_RD0-PHY_RX_D0_PP1') Or InxSignal('ETH_RD1-PHY_RX_D1_PP1') Or InxSignal('ETH_RD2-PHY_RX_D2_PP1') Or InxSignal('ETH_RD3-PHY_RX_D3_PP1')] p2: tolerance=60 checknetsindiffpair=FALSE checkdiffpairvsdiffpair=TRUE checkxsignals=TRUE checkothers=TRUE // APE-SBC setup (gen/pcbsetup.py)
MatchedLengths M_RGMII_TX [InxSignalClass('RGMII_TX')] p3: tolerance=286.12 checknetsindiffpair=FALSE checkdiffpairvsdiffpair=TRUE checkxsignals=TRUE checkothers=TRUE // APE-SBC setup (gen/pcbsetup.py)
MatchedLengths M_RGMII_RX [InxSignalClass('RGMII_RX')] p4: tolerance=286.12 checknetsindiffpair=FALSE checkdiffpairvsdiffpair=TRUE checkxsignals=TRUE checkothers=TRUE // APE-SBC setup (gen/pcbsetup.py)
MatchedLengths M_MMC0 [InxSignalClass('MMC0')] p5: tolerance=45.78 checknetsindiffpair=FALSE checkdiffpairvsdiffpair=TRUE checkxsignals=TRUE checkothers=TRUE // APE-SBC setup (gen/pcbsetup.py)
MatchedLengths M_MMC1 [InxSignalClass('MMC1')] p6: tolerance=45.78 checknetsindiffpair=FALSE checkdiffpairvsdiffpair=TRUE checkxsignals=TRUE checkothers=TRUE // APE-SBC setup (gen/pcbsetup.py)
MatchedLengths M_MMC2 [InxSignalClass('MMC2')] p7: tolerance=45.78 checknetsindiffpair=FALSE checkdiffpairvsdiffpair=TRUE checkxsignals=TRUE checkothers=TRUE // APE-SBC setup (gen/pcbsetup.py)
MatchedLengths M_DPI [InxSignalClass('DPI')] p8: tolerance=572.24 checknetsindiffpair=FALSE checkdiffpairvsdiffpair=TRUE checkxsignals=TRUE checkothers=TRUE // APE-SBC setup (gen/pcbsetup.py)
MatchedLengths M_MCASP [InNetClass('HS_MCASP')] p9: tolerance=572.24 checknetsindiffpair=FALSE checkdiffpairvsdiffpair=TRUE checkxsignals=TRUE checkothers=TRUE // APE-SBC setup (gen/pcbsetup.py)
MatchedLengths M_USB0_Pair [InDifferentialPairClass('USB0')] p10: tolerance=25 checknetsindiffpair=TRUE checkdiffpairvsdiffpair=FALSE checkxsignals=FALSE checkothers=FALSE // APE-SBC setup (gen/pcbsetup.py)
MatchedLengths M_USB1_Pair [InDifferentialPairClass('USB1')] p11: tolerance=25 checknetsindiffpair=TRUE checkdiffpairvsdiffpair=FALSE checkxsignals=FALSE checkothers=FALSE // APE-SBC setup (gen/pcbsetup.py)
MatchedLengths M_USB_DBG_Pair [InDifferentialPairClass('USB_DBG')] p12: tolerance=50 checknetsindiffpair=TRUE checkdiffpairvsdiffpair=FALSE checkxsignals=FALSE checkothers=FALSE // APE-SBC setup (gen/pcbsetup.py)
MatchedLengths M_CSI_Pair [InDifferentialPairClass('CSI')] p13: tolerance=45.78 checknetsindiffpair=TRUE checkdiffpairvsdiffpair=FALSE checkxsignals=FALSE checkothers=FALSE // APE-SBC setup (gen/pcbsetup.py)
MatchedLengths M_CSI_Lanes [InDifferentialPairClass('CSI')] p14: tolerance=228.9 checknetsindiffpair=FALSE checkdiffpairvsdiffpair=TRUE checkxsignals=TRUE checkothers=TRUE // APE-SBC setup (gen/pcbsetup.py)
MatchedLengths M_TMDS_Pair [InDifferentialPairClass('HDMI_TMDS')] p15: tolerance=5 checknetsindiffpair=TRUE checkdiffpairvsdiffpair=FALSE checkxsignals=FALSE checkothers=FALSE // APE-SBC setup (gen/pcbsetup.py)
MaximumViaCount V_TMDS [InDifferentialPairClass('HDMI_TMDS')] p1: limit=0 // APE-SBC setup (gen/pcbsetup.py)
MaximumViaCount V_MDI [InDifferentialPairClass('ETH_MDI')] p2: limit=1 // APE-SBC setup (gen/pcbsetup.py)
MaximumViaCount V_CSI [InDifferentialPairClass('CSI')] p3: limit=2 // APE-SBC setup (gen/pcbsetup.py)
MaximumViaCount V_USB_Split [(InDifferentialPairClass('USB0') Or InDifferentialPairClass('USB1'))] p4: limit=2 // APE-SBC setup (gen/pcbsetup.py)
MaximumViaCount V_USB_DBG [InDifferentialPairClass('USB_DBG')] p5: limit=4 // APE-SBC setup (gen/pcbsetup.py)
MinimumAnnularRing Ring_Via [IsVia] p1: minimumring=1.97 // APE-SBC setup (gen/pcbsetup.py)
MinimumAnnularRing Ring_PTH [IsPad] p2: minimumring=5.91 // APE-SBC setup (gen/pcbsetup.py)
MinimumSolderMaskSliver Mask_Sliver [All] p1: minsoldermaskwidth=3.94 // APE-SBC setup (gen/pcbsetup.py)
PasteMaskExpansion Paste_Windowed [HasFootprintPad('VQFN32_RHB_5X5','33') Or HasFootprintPad('VQFN48_RGZ_7X7','49') Or HasFootprintPad('QFN28_4X4_P0.4','29') Or HasFootprintPad('VQFN32_RSM_4X4','33') Or HasFootprintPad('WQFN38_REF_4X6','39') Or HasFootprintPad('WQFN38_REF_4X6','40') Or HasFootprintPad('VQFN-HR14_RJR_3.5X4','1') Or HasFootprintPad('VQFN-HR14_RJR_3.5X4','10') Or HasFootprintPad('VQFN-HR14_RJR_3.5X4','11') Or HasFootprintPad('VQFN-HR14_RJR_3.5X4','5') Or HasFootprintPad('VQFN-HR14_RJR_3.5X4','9') Or HasFootprintPad('VQFN-HR15_RNM_2.5X3','10') Or HasFootprintPad('VQFN-HR15_RNM_2.5X3','11') Or HasFootprintPad('VQFN-HR15_RNM_2.5X3','9') Or HasFootprintPad('WSON8_DSG_2X2','9') Or HasFootprintPad('WSON6_DRV_2X2','7')] p1: expansion=-98.43 // APE-SBC setup (gen/pcbsetup.py)
PasteMaskExpansion Paste_TagConnect [HasFootprint('TC2070-NL')] p2: expansion=-98.43 // APE-SBC setup (gen/pcbsetup.py)
PasteMaskExpansion Paste_SiP [InComponent('U1')] p3: expansion=1.18 // APE-SBC setup (gen/pcbsetup.py)
PasteMaskExpansion Paste_Default [All] p4: expansion=0 // APE-SBC setup (gen/pcbsetup.py)
PolygonConnect PolygonConnect_1 [IsVia] p1: connectstyle=Direct reliefconductorwidth=10 reliefentries=4 polygonreliefangle="90 Angle" airgapwidth=10
PolygonConnect [All] p2: thpad.connectstyle=Relief thpad.reliefconductorwidth=10 thpad.reliefentries=4 thpad.polygonreliefangle="90 Angle" thpad.airgapwidth=10 smdpad.connectstyle=Direct smdpad.reliefconductorwidth=10 smdpad.reliefentries=4 smdpad.polygonreliefangle="90 Angle" smdpad.airgapwidth=10 via.connectstyle=Relief via.reliefconductorwidth=10 via.reliefentries=4 via.polygonreliefangle="90 Angle" via.airgapwidth=10
RoomDefinition U1_Escape [InComponent('U1') vs False] p1: confinementstyle=ConfineIn formatcopy=TRUE lockcomponents=FALSE outline 1602.36,1425.2 2492.13,1425.2 2492.13,2118.11 1602.36,2118.11 // SiP fan-out region (gen/pcbsetup.py); move it with U1
RoomDefinition U1_SiP [InComponent('U1') vs False] p2: confinementstyle=ConfineIn formatcopy=TRUE lockcomponents=FALSE outline 1720.47,1543.31 2374.02,1543.31 2374.02,2000 1720.47,2000 // SiP fan-out region (gen/pcbsetup.py); move it with U1
RoomDefinition HDMI_Escape [InComponent('U1001') vs False] p3: confinementstyle=ConfineIn formatcopy=TRUE lockcomponents=FALSE outline 3224.41,1295.28 3996.06,1295.28 3996.06,1840.55 3224.41,1840.55 // HDMI escape and connector termination (gen/pcbsetup.py); move it with U1000, U1001, J1000
RoomDefinition U800_Escape [InComponent('U800') vs False] p4: confinementstyle=ConfineIn formatcopy=TRUE lockcomponents=FALSE outline 2507.87,779.53 2940.94,779.53 2940.94,1212.6 2507.87,1212.6 // MDI escape at the PHY (gen/pcbsetup.py); move it with U800
RoomDefinition J1500_Escape [InComponent('J1500') vs False] p5: confinementstyle=ConfineIn formatcopy=TRUE lockcomponents=FALSE outline -78.74,2145.67 374.02,2145.67 374.02,2657.48 -78.74,2657.48 // Debug USB-C termination (gen/pcbsetup.py); move it with J1500
RoomDefinition U900_Escape [InComponent('U900') vs False] p6: confinementstyle=ConfineIn formatcopy=TRUE lockcomponents=FALSE outline 1633.86,629.92 1948.82,629.92 1948.82,944.88 1633.86,944.88 // USB hub escape (gen/pcbsetup.py); move it with U900
RoutingLayers RL_TMDS [InDifferentialPairClass('HDMI_TMDS')] p1: top layer_v5=TRUE mid layer 1_v5=FALSE mid layer 2_v5=FALSE mid layer 3_v5=FALSE mid layer 4_v5=FALSE mid layer 5_v5=FALSE mid layer 6_v5=FALSE bottom layer_v5=FALSE // APE-SBC setup (gen/pcbsetup.py)
RoutingLayers RL_MDI_CSI [(InDifferentialPairClass('ETH_MDI') Or InDifferentialPairClass('CSI'))] p2: top layer_v5=TRUE mid layer 1_v5=FALSE mid layer 2_v5=TRUE mid layer 3_v5=FALSE mid layer 4_v5=FALSE mid layer 5_v5=TRUE mid layer 6_v5=FALSE bottom layer_v5=TRUE // APE-SBC setup (gen/pcbsetup.py)
RoutingLayers RL_RGMII [InNetClass('HS_RGMII_TX') Or InNetClass('HS_RGMII_RX')] p3: top layer_v5=TRUE mid layer 1_v5=FALSE mid layer 2_v5=TRUE mid layer 3_v5=FALSE mid layer 4_v5=FALSE mid layer 5_v5=TRUE mid layer 6_v5=FALSE bottom layer_v5=TRUE // APE-SBC setup (gen/pcbsetup.py)
RoutingLayers RL_SE50_USB [InNetClass('SE50') Or (InDifferentialPairClass('USB0') Or InDifferentialPairClass('USB1') Or InDifferentialPairClass('USB_DBG'))] p4: top layer_v5=TRUE mid layer 1_v5=FALSE mid layer 2_v5=TRUE mid layer 3_v5=FALSE mid layer 4_v5=FALSE mid layer 5_v5=TRUE mid layer 6_v5=FALSE bottom layer_v5=TRUE // APE-SBC setup (gen/pcbsetup.py)
RoutingLayers [All] p5: top layer_v5=TRUE mid layer 1_v5=TRUE mid layer 2_v5=TRUE mid layer 3_v5=TRUE mid layer 4_v5=TRUE mid layer 5_v5=TRUE mid layer 6_v5=TRUE bottom layer_v5=TRUE // APE-SBC setup (gen/pcbsetup.py)
RoutingVias Via_SiP [WithinRoom('U1_SiP')] p1: holewidth=5.91 width=9.84 viastyle="Through Hole" minholewidth=5.91 minwidth=9.84 maxholewidth=5.91 maxwidth=9.84 // APE-SBC setup (gen/pcbsetup.py)
RoutingVias Via_PWR [InNetClass('PWR') Or InNet('GND')] p2: holewidth=11.81 width=19.68 viastyle="Through Hole" minholewidth=7.87 minwidth=13.78 maxholewidth=19.68 maxwidth=31.5 // APE-SBC setup (gen/pcbsetup.py)
RoutingVias Via_Default [All] p3: holewidth=7.87 width=15.75 viastyle="Through Hole" minholewidth=7.87 minwidth=13.78 maxholewidth=19.68 maxwidth=31.5 // APE-SBC setup (gen/pcbsetup.py)
SilkToSilkClearance [All] p1: silktosilkclearance=3.94
SilkToSolderMaskClearance Silk_To_Mask [All] p1: minsilkscreentomaskgap=5.91 clearancetoexposedcopper=TRUE // APE-SBC setup (gen/pcbsetup.py)
SolderMaskExpansion Mask_SiP [InComponent('U1')] p1: expansion=0 istentingtop=FALSE // APE-SBC setup (gen/pcbsetup.py)
SolderMaskExpansion Mask_Via [IsVia] p2: expansion=-11.81 istentingtop=FALSE // APE-SBC setup (gen/pcbsetup.py)
SolderMaskExpansion Mask_Default [All] p3: expansion=1.97 istentingtop=FALSE // APE-SBC setup (gen/pcbsetup.py)
SupplyNets "Schematic Supply Nets_43" [InNet('VCC_5V0')] p1: voltage=0.000
SupplyNets "Schematic Supply Nets_41" [InNet('VCC_3V3_MAIN')] p2: voltage=0.000
SupplyNets "Schematic Supply Nets_39" [InNet('VDD_1V0_PHY')] p3: voltage=0.000
SupplyNets "Schematic Supply Nets_31" [InNet('VBUS_USBC')] p4: voltage=0.000
SupplyNets "Schematic Supply Nets_29" [InNet('VCC_3V3_SYS')] p5: voltage=0.000
SupplyNets "Schematic Supply Nets_28" [InNet('GND')] p6: voltage=0.000
SupplyNets "Schematic Supply Nets_24" [InNet('VDDSHV5_SD')] p7: voltage=0.000
SupplyNets "Schematic Supply Nets_23" [InNet('VDD_1V8')] p8: voltage=0.000
SupplyNets "Schematic Supply Nets_22" [InNet('VSYS_PD')] p9: voltage=0.000
SupplyNets "Schematic Supply Nets_21" [InNet('VPP_EFUSE_1V8')] p10: voltage=0.000
SupplyNets "Schematic Supply Nets_15" [InNet('VCC_3V3_TFP_PVDD')] p11: voltage=0.000
SupplyNets "Schematic Supply Nets_14" [InNet('VCC_5V0_HDR')] p12: voltage=0.000
SupplyNets "Schematic Supply Nets_13" [InNet('VDDA_1V8_MCU')] p13: voltage=0.000
SupplyNets "Schematic Supply Nets_12" [InNet('VCC_3V3_DBG')] p14: voltage=0.000
SupplyNets "Schematic Supply Nets_11" [InNet('VDD_1V8_DBG')] p15: voltage=0.000
SupplyNets "Schematic Supply Nets_6" [InNet('VBUS_DBG')] p16: voltage=0.000
SupplyNets "Schematic Supply Nets_3" [InNet('VDD_CORE_0V85')] p17: voltage=0.000
SupplyNets "Schematic Supply Nets_2" [InNet('VCC_3V3_TFP_DVDD')] p18: voltage=0.000
SupplyNets "Schematic Supply Nets" [InNet('VCC_3V3_TFP_TVDD')] p19: voltage=0.000
Width W_SiP [WithinRoom('U1_SiP')] p1: maxlimit=5.91 minlimit=3.54 preferedwidth=3.54 // APE-SBC setup (gen/pcbsetup.py)
Width W_SE50 [InNetClass('SE50')] p2: maxlimit=7.87 minlimit=3.54 preferedwidth=4.83 toplayer_prefwidth=5.94 bottomlayer_prefwidth=5.94 impedanceprofiledriven=TRUE impedanceprofileid={FEB54D4C-75FC-41D1-831C-25D17BCE5034} impedanceprofilevalue=50.000000 minimp=50.000000 maximp=50.000000 favimp=50.000000 // APE-SBC setup (gen/pcbsetup.py)
Width W_PWR_HI [InNetClass('PWR_HI')] p3: maxlimit=118.11 minlimit=7.87 preferedwidth=39.37 // APE-SBC setup (gen/pcbsetup.py)
Width W_PWR [InNetClass('PWR')] p4: maxlimit=118.11 minlimit=5.91 preferedwidth=15.75 // APE-SBC setup (gen/pcbsetup.py)
Width W_Default [All] p5: maxlimit=118.11 minlimit=3.94 preferedwidth=5.91 // APE-SBC setup (gen/pcbsetup.py)
22 further rules are at their usual default settings.

## Classes and differential pairs
net class LS_AUD_I2C: AUD_I2C_SCL AUD_I2C_SDA
net class LS_I2C0: I2C0_SCL I2C0_SCL_BUS I2C0_SDA I2C0_SDA_BUS
net class HS_CLK: AUD_BCLK AUD_MCLK AUD_MCLK_OSC DPI_PCLK EMMC_CLK EMMC_MOD_CLK ETH_RXC ETH_TXC FT_OSCI FT_OSCO HUB_XI HUB_XO LFOSC_XI LFOSC_XO OSC25M_SRC OSC_25M PHY_GTX_CLK PHY_RX_CLK PHY_XI PHY_XO SD_CLK TFP_IDCK WL_SDIO_CLK
net class HS_MCASP: AUD_BCLK AUD_DIN AUD_DOUT AUD_FSYNC
net class HS_DPI: DPI_D0 DPI_D1 DPI_D2 DPI_D3 DPI_D4 DPI_D5 DPI_D6 DPI_D7 DPI_D8 DPI_D9 DPI_D10 DPI_D11 DPI_D12 DPI_D13 DPI_D14 DPI_D15 DPI_D16 DPI_D17 DPI_D18 DPI_D19 DPI_D20 DPI_D21 DPI_D22 DPI_D23 DPI_DE DPI_HSYNC DPI_PCLK DPI_VSYNC TFP_IDCK
net class HS_MMC2: WL_SDIO_CLK WL_SDIO_CMD WL_SDIO_D0 WL_SDIO_D1 WL_SDIO_D2 WL_SDIO_D3
net class HS_MMC1: SD_CLK SD_CMD SD_D0 SD_D1 SD_D2 SD_D3
net class HS_MMC0: EMMC_CLK EMMC_CMD EMMC_D0 EMMC_D1 EMMC_D2 EMMC_D3 EMMC_D4 EMMC_D5 EMMC_D6 EMMC_D7 EMMC_MOD_CLK
net class HS_RGMII_RX: ETH_RD0 ETH_RD1 ETH_RD2 ETH_RD3 ETH_RX_CTL ETH_RXC PHY_RX_CLK PHY_RX_CTRL PHY_RX_D0 PHY_RX_D1 PHY_RX_D2 PHY_RX_D3
net class HS_RGMII_TX: ETH_TD0 ETH_TD1 ETH_TD2 ETH_TD3 ETH_TX_CTL ETH_TXC PHY_GTX_CLK PHY_TX_CTRL PHY_TX_D0 PHY_TX_D1 PHY_TX_D2 PHY_TX_D3
differential pair class CSI: CSI_CLK CSI_D0 CSI_D1
differential pair class HDMI_TMDS: HDMI_TX0 HDMI_TX1 HDMI_TX2 HDMI_TXC
differential pair class ETH_MDI: ETH_MDI0 ETH_MDI1 ETH_MDI2 ETH_MDI3
differential pair class USB_DBG: DBG_USB
differential pair class USB1: HUB_P1 HUB_P2 USB1 USBA1 USBA2
differential pair class USB0: USB0 USBC1
net class SE50: AUD_MCLK AUD_MCLK_OSC DPI_D0 DPI_D1 DPI_D2 DPI_D3 DPI_D4 DPI_D5 DPI_D6 DPI_D7 DPI_D8 DPI_D9 DPI_D10 DPI_D11 DPI_D12 DPI_D13 DPI_D14 DPI_D15 DPI_D16 DPI_D17 DPI_D18 DPI_D19 DPI_D20 DPI_D21 DPI_D22 DPI_D23 DPI_DE DPI_HSYNC DPI_PCLK DPI_VSYNC EMMC_CLK EMMC_CMD EMMC_D0 EMMC_D1 EMMC_D2 EMMC_D3 EMMC_D4 EMMC_D5 EMMC_D6 EMMC_D7 EMMC_MOD_CLK EMMC_MOD_DS ETH_RD0 ETH_RD1 ETH_RD2 ETH_RD3 ETH_RX_CTL ETH_RXC ETH_TD0 ETH_TD1 ETH_TD2 ETH_TD3 ETH_TX_CTL ETH_TXC OSC25M_SRC OSC_25M PHY_GTX_CLK PHY_RX_CLK PHY_RX_CTRL PHY_RX_D0 PHY_RX_D1 PHY_RX_D2 PHY_RX_D3 PHY_TX_CTRL PHY_TX_D0 PHY_TX_D1 PHY_TX_D2 PHY_TX_D3 SD_CLK SD_CMD SD_D0 SD_D1 SD_D2 SD_D3 TFP_IDCK WL_SDIO_CLK WL_SDIO_CMD WL_SDIO_D0 WL_SDIO_D1 WL_SDIO_D2 WL_SDIO_D3
net class PWR_HI: BB_L1 BB_L2 LM_SW PMIC_LX_B1 PMIC_LX_B2 PMIC_LX_B3 VBUS_USBC VCC_3V3_MAIN VCC_3V3_SYS VCC_5V0 VDD_1V8 VDD_CORE_0V85 VDDS_DDR_1V2 VSYS_PD
net class PWR_OTHER: VDD_1V0_PHY VDD_LDO2 VDD_SDIO_LDO1 VDDA_2V5_PHY VDDA_3P3_USB VDDSHV5_SD
net class PWR_3V3: VCC_3V3_CAM VCC_3V3_DBG VCC_3V3_FTPHY VCC_3V3_FTPLL VCC_3V3_MAIN VCC_3V3_SYS VCC_3V3_TFP_DVDD VCC_3V3_TFP_PVDD VCC_3V3_TFP_TVDD VDD_SD_3V3 VDDA_3V3_AUD
net class PWR_1V8: VDD_1V8 VDD_1V8_DBG VDDA_1V8 VDDA_1V8_CSI VDDA_1V8_MCU VDDA_1V8_OLDI VDDA_1V8_PLL0 VDDA_1V8_PLL1 VDDA_1V8_PLL2 VDDA_1V8_USB VDDS_OSC0_1V8 VPP_EFUSE_1V8
net class PWR_DDR: DDR4_VPP_2V5 DDR4_VPP_2V5_SIP VDDS_DDR_1V2
net class PWR_CORE: VDD_CORE_0V85 VDDA_CORE_CSI_0V85 VDDA_CORE_USB_0V85
net class PWR_IN: VBUS_DBG VBUS_USBA1 VBUS_USBA2 VBUS_USBC VCC_5V0 VCC_5V0_HDMI VCC_5V0_HDR VSYS_PD
net class PWR: DDR4_VPP_2V5 DDR4_VPP_2V5_SIP VBUS_DBG VBUS_USBA1 VBUS_USBA2 VBUS_USBC VCC_3V3_CAM VCC_3V3_DBG VCC_3V3_FTPHY VCC_3V3_FTPLL VCC_3V3_MAIN VCC_3V3_SYS VCC_3V3_TFP_DVDD VCC_3V3_TFP_PVDD VCC_3V3_TFP_TVDD VCC_5V0 VCC_5V0_HDMI VCC_5V0_HDR VDD_1V0_PHY VDD_1V8 VDD_1V8_DBG VDD_CORE_0V85 VDD_LDO2 VDD_SD_3V3 VDD_SDIO_LDO1 VDDA_1V8 VDDA_1V8_CSI VDDA_1V8_MCU VDDA_1V8_OLDI VDDA_1V8_PLL0 VDDA_1V8_PLL1 VDDA_1V8_PLL2 VDDA_1V8_USB VDDA_2V5_PHY VDDA_3P3_USB VDDA_3V3_AUD VDDA_CORE_CSI_0V85 VDDA_CORE_USB_0V85 VDDS_DDR_1V2 VDDS_OSC0_1V8 VDDSHV5_SD VPP_EFUSE_1V8 VSYS_PD
component class 16_Misc: C1600 C1601 H1600 H1601 H1602 H1603 LED1600 LED1601 LED1602 LED1603 R1600 R1601 R1602 R1603 R1604 R1605 R1606 R1607 R1608 R1609 R1610 R1620 R1621 TP1600 TP1601 TP1602 U1600 U1601
component class 15_Debug: C1500 C1501 C1502 C1503 C1504 C1505 C1506 C1507 C1508 C1509 C1510 C1511 C1512 C1513 C1514 C1515 C1516 C1517 C1518 C1519 C1520 C1521 C1522 C1523 C1524 C1525 D1500 FB1500 FB1501 J1500 J1501 R1500 R1501 R1503 R1504 R1505 R1507 R1508 R1509 R1510 R1511 R1512 R1513 R1514 R1515 R1516 R1517 R1518 R1520 R1521 R1522 R1523 R1524 R1525 R1526 R1527 R1528 R1529 TP1500 U1500 U1501 U1502 U1503 U1504 U1505 U1510 U1511 Y1500
component class 14_Expansion: C1400 C1401 C1402 C1403 C1404 C1405 C1406 C1407 F1400 J1400 R1400 R1401 R1402 R1403 R1404 R1405 R1406 R1407 R1408 R1409 R1410 R1411 R1412 R1413 R1414 R1415 R1416 R1417 R1418 R1419 R1420 R1421 R1422 R1423 R1424 R1425 R1426 R1427 R1428 R1429 R1430 R1431 R1432 R1433 TP1400 U1400
component class 13_Wireless: C1300 C1301 C1302 C1303 C1304 C1305 H1300 J1300 R1305 R1306 R1307 R1308 R1309 R1310 R1311 R1312 R1315 R1316 R1317 R1319 R1322 R1323 TP1300 TP1301
component class 12_Camera: C1200 C1201 C1202 C1203 FB1200 J1200 R1200 R1201 R1202
component class 11_Audio: C1100 C1101 C1102 C1103 C1104 C1105 C1106 C1107 C1108 C1109 C1110 C1111 C1112 C1113 C1114 C1115 D1100 D1101 D1102 FB1100 J1100 R1100 R1101 R1102 R1103 R1104 R1105 R1106 R1107 R1108 R1109 R1110 R1111 R1112 U1100 Y1100
component class 10_HDMI: C1000 C1001 C1002 C1003 C1004 C1005 C1006 C1007 C1008 C1009 C1010 C1011 C1012 C1013 C1014 C1015 C1016 C1017 C1018 C1019 C1020 FB1000 FB1001 FB1002 FB1003 J1000 R1000 R1001 R1002 R1003 R1004 R1005 R1006 R1007 R1008 R1009 R1010 R1011 R1012 R1013 R1014 R1015 R1016 TP1000 TP1001 U1000 U1001
component class 09_USB: C900 C901 C902 C903 C904 C905 C906 C907 C908 C909 C910 C911 C912 C913 D900 D901 D902 D903 D904 D905 J900 L900 L901 L902 R902 R903 R904 R905 R906 R907 R908 R909 R910 R911 R912 R913 U900 U901 U902 Y900
component class 08_Ethernet: C800 C801 C802 C803 C804 C805 C806 C807 C808 C809 C810 C811 C812 C813 C814 C815 C816 C817 C818 C819 C820 C821 C822 C823 C824 C825 C826 C830 C831 FB800 J800 R800 R801 R802 R803 R804 R805 R806 R807 R808 R809 R810 R811 R812 R813 R814 R815 R820 R821 R822 R823 R840 R841 U800 Y800
component class 07_Storage: C700 C701 C702 C703 C704 C705 C710 C711 C712 C713 C714 C715 J700 J701 J702 R700 R701 R702 R703 R704 R705 R706 R707 R708 R709 R710 R711 R712 R713 R720 R721 R722 R723 R724 R725 R726 R727 R728 R730 R731 R732 U700 U701 U702 U703
component class 06_Clock_Reset_Boot: C600 C601 C602 C603 C604 C605 C606 C607 C608 C609 D600 D601 R600 R601 R603 R604 R605 R606 R607 R608 R609 R610 R611 R612 R613 R620 R621 R622 R623 R624 R625 R626 R627 R628 R629 R630 R631 R632 R633 R634 R635 R636 R637 R638 R639 R640 R641 R642 R643 R644 R645 R646 R647 R648 R649 R650 R651 SW600 SW601 SW602 TP600 TP601 TP602 TP603 TP604 TP605 TP606 U600 U601 U602 Y600
component class 03_SiP_Power: C300 C301 C302 C303 C304 C305 C306 C307 C308 C309 C310 C311 C312 C313 C314 C315 C316 C317 C318 C319 C320 C321 C322 C323 C324 C325 C326 C327 C328 C329 C330 C331 C332 C333 C334 C335 C339 C358 C359 C360 FB300 FB301 FB302 FB303 FB304 FB305 FB306 FB307 FB308 FB309 FB310 FB311 R301 R302 TP300 TP301 TP302 TP303 TP304 TP305 TP306 TP307 TP308 TP309 TP310 TP311 TP312 U1
component class 02_PMIC: C200 C201 C202 C203 C204 C205 C206 C207 C208 C209 C210 C211 C212 C213 C214 C215 C216 C217 C218 C219 C220 C221 C222 C223 C224 C225 C226 C227 C228 D200 L200 L201 L202 R200 R201 R202 R203 R204 R205 R206 R208 R209 R210 SW200 TP200 TP201 TP202 TP203 TP204 U200 U201 U202 U203
component class 01_Power_Input: C100 C101 C102 C103 C104 C105 C106 C107 C108 C109 C110 C111 C112 C113 C114 C115 C116 C117 C118 C119 C120 C121 C122 C123 C124 C125 C126 C127 C128 D100 D101 D102 D103 J100 L100 L101 R100 R101 R102 R103 R104 R105 R106 R107 R108 R109 R110 R111 R112 R113 R114 R115 R117 R118 R119 R120 R121 R122 R123 R124 R125 TP100 TP101 TP102 TP103 TP104 TP105 U100 U101 U102
differential pair CSI_D1: +CSI_D1_P -CSI_D1_N
differential pair CSI_D0: +CSI_D0_P -CSI_D0_N
differential pair CSI_CLK: +CSI_CLK_P -CSI_CLK_N
differential pair HDMI_TXC: +HDMI_TXC_P -HDMI_TXC_N
differential pair HDMI_TX2: +HDMI_TX2_P -HDMI_TX2_N
differential pair HDMI_TX1: +HDMI_TX1_P -HDMI_TX1_N
differential pair HDMI_TX0: +HDMI_TX0_P -HDMI_TX0_N
differential pair ETH_MDI3: +ETH_MDI3_P -ETH_MDI3_N
differential pair ETH_MDI2: +ETH_MDI2_P -ETH_MDI2_N
differential pair ETH_MDI1: +ETH_MDI1_P -ETH_MDI1_N
differential pair ETH_MDI0: +ETH_MDI0_P -ETH_MDI0_N
differential pair DBG_USB: +DBG_USB_DP -DBG_USB_DM
differential pair USBA2: +USBA2_DP -USBA2_DM
differential pair USBA1: +USBA1_DP -USBA1_DM
differential pair HUB_P2: +HUB_P2_DP -HUB_P2_DM
differential pair HUB_P1: +HUB_P1_DP -HUB_P1_DM
differential pair USB1: +USB1_DP -USB1_DM
differential pair USBC1: +USBC1_DP -USBC1_DM
differential pair USB0: +USB0_DP -USB0_DM

## Components (designator, comment, footprint, x,y, rotation, side; value= is the part's Value field where it differs from the comment)
C100 "4.7uF" C0805 206.69,1273.62 r180 top
C101 "100nF" C0603 403.54,1391.73 r0 top
C102 "330pF" C0402 433.07,1155.51 r270 top
C103 "330pF" C0402 364.17,1149.61 r270 top
C104 "10uF" C0603 383.86,978.35 r180 top
C105 "10uF" C0603 403.54,1056.1 r180 top
C106 "10uF" C0603 755,1043.35 r90 top
C107 "22uF" C1206 687.01,1434.05 r90 top
C108 "22uF" C1206 785.43,1276.57 r0 top
C109 "10uF" C1206 401.58,826.77 r90 top
C110 "100nF" C0603 364.17,651.58 r270 top
C111 "10uF" C1206 712.6,822.84 r90 top
C112 "100nF" C0603 716.54,966.54 r0 top
C113 "1uF" C0402 306.1,879.92 r270 top
C114 "100nF" C0402 753.94,683.07 r0 top
C115 "100nF" C0402 732.28,595.47 r90 top
C116 "4.7pF" C0402 807.09,1145.67 r180 top
C117 "47uF" C1206 405.51,291.34 r180 top
C118 "47uF" C1206 606.3,291.34 r0 top
C119 "47uF" C1206 405.51,185.04 r180 top
C120 "47uF" C1206 606.3,185.04 r0 top
C121 "10uF" C0805 1063.98,1157.48 r0 top
C122 "10uF" C0805 936.02,1226.38 r90 top
C123 "100nF" C0603 926.18,1108.27 r180 top
C124 "100nF" C0402 1037.4,1240.16 r0 top
C125 "22uF" C1206 909.45,826.77 r180 top
C126 "22uF" C1206 1110.24,807.09 r0 top
C127 "22uF" C1206 909.45,716.54 r180 top
C128 "10uF" C0603 1082.68,714.57 r0 top
C200 "4.7uF" C0603 1749.02,1271.65 r90 top
C201 "100nF" C0402 1670.28,1188.98 r270 bottom
C202 "4.7uF" C0603 1401.57,1125 r180 top
C203 "4.7uF" C0603 1427.16,1233.27 r90 top
C204 "2.2uF" C0402 1645.67,1365.16 r90 top
C205 "2.2uF" C0402 1601.38,1293.31 r180 bottom
C206 "2.2uF" C0402 1479.33,1188.98 r270 bottom
C207 "4.7uF" C0603 1380.91,1049.21 r180 top
C208 "2.2uF" C0402 1462.6,1345.47 r180 top
C209 "22uF" C0805 1566.93,1384.84 r90 top
C210 "22uF" C0805 1799.21,1001.97 r0 top
C211 "22uF" C0805 1759.84,1415.35 r90 top
C212 "22uF" C0805 1391.73,893.7 r270 top
C213 "22uF" C0805 1283.47,824.8 r270 top
C214 "22uF" C0805 1267.72,1041.34 r90 top
C215 "22uF" C0805 1287.4,667.32 r270 top
C216 "2.2uF" C0402 1699.8,1269.68 r0 bottom
C217 "2.2uF" C0402 1459.65,1273.62 r180 bottom
C218 "2.2uF" C0402 1518.7,1104.33 r0 bottom
C219 "2.2uF" C0402 1401.57,1094.49 r180 bottom
C220 "47pF" C0402 2303.15,2141.73 r270 bottom
C221 "220pF" C0402 1169.29,1358.27 r180 top
C222 "2.2uF" C0402 1251.97,1348.43 r90 top
C223 "10uF" C0603 1140,1580 r90 top
C224 "100nF" C0402 1169.29,1269.68 r90 top
C225 "1uF" C0402 2163.39,2216.53 r0 top
C226 "2.2uF" C0402 2163.39,2114.17 r0 top
C227 "1uF" C0402 2728.35,598.42 r180 bottom
C228 "1uF" C0402 2645.67,578.74 r270 bottom
C300 "22pF" C0402 2122.05,2031.5 r0 top
C301 "10uF" C0603 1722.44,1338.58 r180 bottom
C302 "100nF" C0402 1960.63,1596.46 r180 bottom
C303 "100nF" C0402 2059.05,1596.46 r0 bottom
C304 "100nF" C0402 2155.51,2057.09 r0 bottom
C305 "100nF" C0402 2131.89,2141.73 r270 bottom
C306 "100nF" C0402 1846.46,2141.73 r270 bottom
C307 "100nF" C0402 1732.28,2141.73 r270 bottom
C308 "4.7uF" C0402 2102.36,1346.46 r270 bottom
C309 "100nF" C0402 2102.36,1440.95 r90 bottom
C310 "4.7uF" C0402 2167.32,1346.46 r270 bottom
C311 "100nF" C0402 2167.32,1440.95 r90 bottom
C312 "4.7uF" C0402 1663.39,1801.18 r180 bottom
C313 "100nF" C0402 1763.78,1931.1 r0 bottom
C314 "100nF" C0402 2338.58,1440.95 r90 bottom
C315 "100nF" C0402 2293.31,1599.21 r0 bottom
C316 "100nF" C0402 2338.58,1346.46 r270 bottom
C317 "100nF" C0402 2340.55,1250 r270 bottom
C318 "100nF" C0402 1763.78,1655.51 r180 bottom
C319 "100nF" C0402 1763.78,1714.57 r180 bottom
C320 "100nF" C0402 1763.78,1773.62 r180 bottom
C321 "100nF" C0402 1874.02,1440.95 r90 bottom
C322 "1uF" C0402 1816.93,1250 r90 bottom
C323 "100nF" C0402 1816.93,1346.46 r90 bottom
C324 "1uF" C0402 2224.41,1346.46 r270 bottom
C325 "100nF" C0402 2224.41,1440.95 r90 bottom
C326 "1uF" C0402 2281.5,1346.46 r270 bottom
C327 "100nF" C0402 2281.5,1440.95 r90 bottom
C328 "1uF" C0402 1960.63,2236.22 r90 bottom
C329 "100nF" C0402 1960.63,1970.47 r180 bottom
C330 "4.7uF" C0402 2045.28,1346.46 r270 bottom
C331 "100nF" C0402 2045.28,1440.95 r90 bottom
C332 "4.7uF" C0402 1988.19,1346.46 r270 bottom
C333 "100nF" C0402 1988.19,1440.95 r90 bottom
C334 "1uF" C0402 1931.1,1346.46 r270 bottom
C335 "100nF" C0402 1931.1,1440.95 r90 bottom
C339 "100nF" C0402 1763.78,1596.46 r180 bottom
C358 "1uF" C0402 2352.36,2047.24 r0 bottom
C359 "1uF" C0402 2390,1800 r270 bottom
C360 "100nF" C0402 2253.94,2047.24 r0 bottom
C600 "10nF" C0402 1674.21,2063.98 r90 top
C601 "1uF" C0402 1605.32,2063.98 r90 top
C602 "18pF" C0402 1578.74,1641.73 r180 top
C603 "18pF" C0402 1480.32,1641.73 r180 top
C604 "100nF" C0402 1460,1590 r90 top
C605 "22pF" C0402 1789.37,2141.73 r90 bottom
C606 "100nF" C0402 127.95,59.06 r90 bottom
C607 "100nF" C0402 137.8,354.33 r0 bottom
C608 "100nF" C0402 2312.99,2748.03 r0 bottom
C609 "22pF" C0402 2360.24,2141.73 r90 bottom
C700 "10uF" C0603 1210.63,1962.6 r90 bottom
C701 "100nF" C0402 1299.21,1933.07 r180 bottom
C702 "4.7uF" C0603 1387.8,1964.57 r90 bottom
C703 "100nF" C0402 1476.38,1777.56 r0 bottom
C704 "100nF" C0402 1476.38,1846.46 r0 bottom
C705 "100nF" C0402 1503.94,2102.36 r90 bottom
C710 "1uF" C0402 2875,2390 r90 top
C711 "1uF" C0402 2982.68,2263.78 r0 top
C712 "100nF" C0402 2913.78,2460.63 r180 top
C713 "2.2uF" C0402 3151.77,2338.58 r180 top
C714 "100nF" C0402 3387.99,2309.05 r0 top
C715 "100nF" C0402 3090.16,2263.78 r0 top
C800 "15pF" C0402 2954.72,1066.93 r180 bottom
C801 "15pF" C0402 3021.65,980.32 r180 bottom
C802 "22pF" C0402 2955,885 r90 top
C803 "10uF" C0603 3005.91,897.64 r0 bottom
C804 "10nF" C0402 2927.16,986.22 r270 bottom
C805 "1uF" C0402 2858.27,1084.65 r90 bottom
C806 "100nF" C0402 2858.27,986.22 r270 bottom
C807 "1uF" C0402 2714.57,1198.82 r180 bottom
C808 "100nF" C0402 2714.57,1129.92 r180 bottom
C809 "1uF" C0402 2590.55,1104.33 r90 bottom
C810 "100nF" C0402 2590.55,1005.91 r270 bottom
C811 "10uF" C0603 2881.89,685.04 r0 bottom
C812 "10nF" C0402 2863.18,917.5 r90 bottom
C813 "1uF" C0402 2586.61,901.58 r180 bottom
C814 "100nF" C0402 2694.41,819.04 r270 bottom
C815 "1uF" C0402 2891.73,862.2 r0 bottom
C816 "100nF" C0402 2793.31,862.2 r0 bottom
C817 "10uF" C0603 2537.4,665.35 r180 bottom
C818 "10nF" C0402 2498.03,803.15 r270 bottom
C819 "1uF" C0402 2566.93,753.94 r270 bottom
C820 "100nF" C0402 2852.36,773.62 r270 bottom
C821 "1uF" C0402 2927.16,1153.54 r90 bottom
C822 "100nF" C0402 2858.27,1183.07 r90 bottom
C823 "1uF" C0402 2694.88,1267.72 r180 bottom
C824 "100nF" C0402 2616.14,1188.98 r180 bottom
C825 "1uF" C0402 2433.07,907.48 r270 bottom
C826 "100nF" C0402 2501.97,907.48 r270 bottom
C830 "100nF" C0402 2900,605 r180 top
C831 "1nF" C1206 3649.41,688.98 r90 top
C900 "1uF" C0402 1704.25,801.18 r90 bottom
C901 "100nF" C0402 1635.35,801.18 r90 bottom
C902 "10uF" C0603 1801.18,972.91 r90 bottom
C903 "1uF" C0402 1811.02,874.49 r0 bottom
C904 "100nF" C0402 1712.6,884.33 r180 bottom
C905 "10uF" C0805 1271.65,777.56 r180 bottom
C906 "100nF" C0402 1379.92,787.4 r90 bottom
C907 "150uF" CP_SMD_D6.3X5.8 960.63,161.42 r180 top
C908 "100nF" C0402 1309.05,374.02 r180 bottom
C909 "10uF" C0805 1537.4,875.98 r90 bottom
C910 "100nF" C0402 1537.4,748.03 r270 bottom
C911 "150uF" CP_SMD_D6.3X5.8 960.63,456.69 r180 top
C912 "100nF" C0402 1309.05,600.39 r90 bottom
C913 "4.7nF" C1206 1626.77,265.75 r180 bottom
C1000 "10uF" C0603 2854.33,1281.5 r180 bottom
C1001 "100nF" C0402 2864.17,1350.39 r180 bottom
C1002 "100nF" C0402 2962.6,1350.39 r0 bottom
C1003 "100nF" C0402 3080.71,1350.39 r180 bottom
C1004 "100nF" C0402 3179.13,1897.64 r90 top
C1005 "10uF" C0603 3324.8,1348.43 r270 bottom
C1006 "100nF" C0402 3236.22,1446.85 r180 bottom
C1007 "100nF" C0402 3310,1410 r180 bottom
C1008 "100nF" C0402 3236.22,1377.95 r180 bottom
C1009 "100nF" C0402 3236.22,1515.75 r180 bottom
C1010 "10uF" C0603 3360,1785 r90 bottom
C1011 "100nF" C0402 3236.22,1584.65 r180 bottom
C1012 "100nF" C0402 3334.65,1584.65 r0 bottom
C1013 "100nF" C0402 3236.22,1663.39 r180 bottom
C1014 "100nF" C0402 3334.65,1663.39 r0 bottom
C1015 "100nF" C0402 3771.65,1731.3 r180 bottom
C1016 "10uF" C0603 3765,1785 r180 bottom
C1017 "100nF" C0402 3582.68,1475.39 r0 bottom
C1018 "10uF" C0603 3533.47,1406.5 r180 bottom
C1019 "100nF" C0402 3771.65,1449.8 r180 bottom
C1020 "10uF" C0603 3761.81,1380.91 r180 bottom
C1100 "10uF" C0603 3771.65,2765.75 r0 top
C1101 "100nF" C0402 3685,2645 r0 top
C1102 "1uF" C0402 3683.07,2687.01 r0 top
C1103 "100nF" C0402 3787.4,2624.02 r0 top
C1104 "100nF" C0402 3600.39,2732.28 r90 top
C1105 "1uF" C0402 3787.4,2692.91 r0 top
C1106 "10uF" C0603 3669.29,2781.5 r90 top
C1107 "100nF" C0402 3780,2305 r0 top
C1108 "1uF" C0402 3901.97,2347.48 r270 top
C1109 "100nF" C0402 3455,2420 r90 top
C1110 "1uF" C0402 3430,2270 r180 top
C1111 "47uF" C0805 4177.94,2678.18 r0 top
C1112 "47uF" C0805 3659.45,2919.29 r90 top
C1113 "0.47uF" C0402 3865,2685 r270 top
C1114 "100nF" C0402 3675,1975 r0 top
C1115 "1uF" C0402 3616.14,2096.46 r180 top
C1200 "10uF" C0603 2706.69,118.11 r90 bottom
C1201 "1uF" C0402 2568.9,108.27 r90 bottom
C1202 "100nF" C0402 2637.8,108.27 r90 bottom
C1203 "100nF" C0402 2559.05,206.69 r90 bottom
C1300 "22uF" C0805 3115.35,2086.61 r0 bottom
C1301 "10uF" C0603 2888.98,3011.81 r180 bottom
C1302 "100nF" C0402 3007.09,2933.07 r90 bottom
C1303 "10uF" C0603 2888.98,2027.56 r180 bottom
C1304 "100nF" C0402 3007.09,2086.61 r270 bottom
C1305 "100nF" C0402 3095.67,2244.09 r270 bottom
C1400 "47pF" C0402 1846.46,2047.24 r270 bottom
C1401 "47pF" C0402 1789.37,2047.24 r90 bottom
C1402 "47pF" C0402 1903.54,2047.24 r90 bottom
C1403 "47pF" C0402 1903.54,2141.73 r90 bottom
C1404 "100nF" C0402 1787.4,2813.98 r0 top
C1405 "10uF" C0603 206.69,2834.65 r180 bottom
C1406 "10uF" C0603 334.65,2834.65 r0 bottom
C1407 "100nF" C0402 216.54,2765.75 r180 bottom
C1500 "4.7uF" C0603 167.32,2673.23 r180 top
C1501 "100nF" C0402 265.75,2722.44 r90 top
C1502 "100nF" C0402 374.02,2785.43 r0 top
C1503 "1uF" C0402 127.95,2104.33 r180 top
C1504 "2.2uF" C0402 324.8,2005.91 r270 top
C1505 "100nF" C0402 226.38,2104.33 r180 top
C1506 "10uF" C0603 866.14,2615.67 r90 bottom
C1507 "100nF" C0402 374.02,2273.62 r270 bottom
C1508 "100nF" C0402 873.54,2214.57 r180 bottom
C1509 "100nF" C0402 521.65,2605.83 r90 bottom
C1510 "100nF" C0402 797.24,2566.46 r270 bottom
C1511 "100nF" C0402 561.02,2138.27 r180 bottom
C1512 "100nF" C0402 777.56,2138.27 r180 bottom
C1513 "100nF" C0402 784.96,2391.73 r180 bottom
C1514 "100nF" C0402 679.13,2566.46 r270 bottom
C1515 "4.7uF" C0402 329.29,2531.09 r270 bottom
C1516 "100nF" C0402 383.86,2470.47 r90 bottom
C1517 "4.7uF" C0402 305.12,2431.1 r90 bottom
C1518 "100nF" C0402 305.12,2332.68 r270 bottom
C1519 "33pF" C0402 452.76,2598.43 r90 bottom
C1520 "33pF" C0402 314.96,2608.27 r90 bottom
C1521 "100nF" C0402 590.55,2598.43 r90 bottom
C1522 "100nF" C0402 1066.93,2680.12 r90 top
C1523 "100nF" C0402 1295.28,2680.12 r90 top
C1524 "100nF" C0402 1086.61,2111.22 r0 top
C1525 "100nF" C0402 1393.7,2229.33 r0 top
C1600 "100nF" C0402 2409.45,2830.91 r0 top
C1601 "10nF" C0402 2381.5,2500 r90 top
D100 "TVS2200DRVR" WSON6_DRV_2X2 354.33,1263.78 r180 top
D101 "PESD24VL1BA" SOD323 501.97,1683.07 r0 top
D102 "PESD24VL1BA" SOD323 541.34,1387.8 r0 top
D103 "SS34" DIO_SMA 344.49,1816.93 r180 top
D200 "TPD1E10B06" X1SON2_DPY 49.21,669.29 r180 bottom
D600 "TPD1E10B06DPYR" X1SON2_DPY 59.06,59.06 r90 bottom
D601 "TPD1E10B06DPYR" X1SON2_DPY 49.21,354.33 r180 bottom
D900 "ESD122DMXR" X2SON3_DMX 383.86,1663.39 r270 top
D901 "LBZX84C6V8LT1G" SOT23-3 383.86,1440.95 r180 bottom
D902 "BAT54WS-7-F" SOD323 1688.98,963.07 r180 bottom
D903 "LBZX84C6V8LT1G" SOT23-3 1408.47,984.25 r0 bottom
D904 "USBLC6-2SC6" SOT23-6 1465,220 r90 bottom
D905 "USBLC6-2SC6" SOT23-6 1840,620 r180 bottom
D1100 "TPD1E10B06DPYR" X1SON2_DPY 4242.13,2610.24 r270 top
D1101 "TPD1E10B06DPYR" X1SON2_DPY 4173.23,2610.24 r270 top
D1102 "TPD1E10B06DPYR" X1SON2_DPY 4094.49,2610.24 r270 top
D1500 "TPD1E10B06DPYR" X1SON2_DPY 196.85,2604.33 r180 top
F1400 "BSMD1206-110-6V (1.1A hold)" FUSE_BHFUSE_BSMD1206 108.27,2696.85 r270 bottom
FB300 "BLM18SG260TN1D" FB0603 2102.36,1242.13 r90 bottom
FB301 "BLM18SG260TN1D" FB0603 2169.29,1242.13 r90 bottom
FB302 "BLM15PX121SN1D" FB0402 1874.02,1346.46 r90 bottom
FB303 "BLM15PX121SN1D" FB0402 1874.02,1250 r270 bottom
FB304 "BLM15PX121SN1D" FB0402 2230.32,1250 r90 bottom
FB305 "BLM15PX121SN1D" FB0402 2285.43,1250 r90 bottom
FB306 "BLM15PX121SN1D" FB0402 2074.8,2236.22 r270 bottom
FB307 "BLM15PX121SN1D" FB0402 2041.34,1250 r90 bottom
FB308 "BLM15PX121SN1D" FB0402 1931.1,1250 r90 bottom
FB309 "BLM15PX121SN1D" FB0402 1988.19,1250 r90 bottom
FB310 "BLM15PX121SN1D" FB0402 2017.72,2236.22 r270 bottom
FB311 "BLM15PX121SN1D" FB0402 1816.93,1440.95 r90 bottom
FB800 "BLM15PX121SN1D" FB0402 2590.55,838.58 r0 bottom
FB1000 "BLM18KG601SN1D" FB0603 2814.96,1419.29 r0 bottom
FB1001 "BLM18KG601SN1D" FB0603 3344.49,1515.75 r180 bottom
FB1002 "BLM18KG601SN1D" FB0603 3462.6,1515.75 r180 bottom
FB1003 "BLM18PG121SN1D" FB0603 3966.14,1848.43 r90 top
FB1100 "BLM18KG601SN1D" FB0603 3751.97,2864.17 r270 top
FB1200 "BLM18KG601SN1D" FB0603 2627.95,216.54 r270 bottom
FB1500 "BLM18PG121SN1D" FB0603 383.86,2578.74 r270 bottom
FB1501 "BLM18PG121SN1D" FB0603 408.84,2133.65 r90 bottom
H1300 "9774015243R M2 SMT standoff 1.5 mm" STANDOFF_WE_9774015243R 4150,2010 r180 bottom
H1600 "M2.5 plated" MH_M2.5_PLATED 137.8,1082.68 r0 top
H1601 "M2.5 plated" MH_M2.5_PLATED 2421.26,1082.68 r0 top
H1602 "M2.5 plated" MH_M2.5_PLATED 137.8,3011.81 r0 top
H1603 "M2.5 plated" MH_M2.5_PLATED 2421.26,3011.81 r0 top
J100 "TYPE-C-31-M-12" USB-C_HRO_TYPE-C-31-M-12 125.39,1535.43 r270 top
J700 "GB042-34P-H10-E3000" B2B_LSM_GB042-34P-H10 1338.58,1653.54 r90 bottom
J701 "GB042-30P-H10-E3000 (DNP, retention only)" B2B_LSM_GB042-30P-H10 826.77,1653.54 r90 bottom
J702 "TF-01A" MICROSD_HRO_TF-01A 3216.53,2864.17 r180 top
J800 "HR911130A" RJ45_HANRUN_HR911130A 3216.53,301.18 r0 top
J900 "61400826021" USBA_2X_BX-TYPE-A-MWC44 1535.43,208.66 r0 top
J1000 "HDMI-A-19F-S-D" HDMI_A_XFCN_19F_S_D 4145.67,1454.72 r90 top
J1100 "PJ-320DB-5A" JACK_HRO_PJ-320DB 4114.17,2911.42 r180 top
J1200 "1-1734248-5" FPC_TE_1-1734248-5 2355,305 r180 top
J1300 "APCI0085-P002A" M2_KEYE_APCI0085 2775.59,2519.68 r270 bottom
J1400 "2541WV-2x20P" HDR_2X20_P2.54_THT 1279.53,3011.81 r0 top
J1500 "TYPE-C-31-M-12" USB-C_HRO_TYPE-C-31-M-12 125.39,2362.2 r270 top
J1501 "TC2070-NL-FP (footprint only, no part)" TC2070-NL 1181.1,2413.39 r180 bottom
L100 "4.7uH" IND_SUNLORD_MWSA0603S 551.18,527.56 r270 top
L101 "1.5uH" IND_SUNLORD_MWSA0402S 1110.24,984.25 r270 top
L200 "0.47uH" IND_MURATA_DFE252012F 1759.84,1129.92 r270 top
L201 "0.47uH" IND_MURATA_DFE252012F 1637.8,972.44 r270 top
L202 "0.47uH" IND_MURATA_DFE252012F 1503.94,972.44 r270 top
L900 "SDCW2012-2-900TF" CMC_SUNLORD_SDCW2012 433.07,1535.43 r0 top
L901 "SDCW2012-2-900TF" CMC_SUNLORD_SDCW2012 1750,625 r180 top
L902 "SDCW2012-2-900TF" CMC_SUNLORD_SDCW2012 2003.46,714.25 r0 bottom
LED1600 "KT-0805G" LED0805 3700.79,531.5 r0 top
LED1601 "KT-0805G" LED0805 3866.14,531.5 r0 top
LED1602 "KT-0603R" LED0603 4015.75,531.5 r0 top
LED1603 "KT-0603R" LED0603 4149.61,531.5 r0 top
R100 "100k" R0402 551.18,1056.1 r0 bottom
R101 "4.99k" R0402 629.92,1036.42 r270 bottom
R102 "100k" R0402 549.21,997.05 r0 bottom
R103 "4.99k" R0402 677.16,1115.16 r0 bottom
R104 "10k" R0402 472.44,1275.59 r180 bottom
R105 "10k" R0402 472.44,1210.63 r180 bottom
R106 "10k" R0402 472.44,1118.11 r180 bottom
R107 "10k" R0402 660.43,1279.53 r270 bottom
R108 "10k" R0402 1761.81,2224.41 r180 bottom
R109 "100k" R0402 601.38,1324.8 r270 bottom
R110 "100k" R0402 452.76,1053.15 r0 bottom
R111 "100k" R0402 680.12,1181.1 r180 bottom
R112 "100k" R0402 709.65,1055.12 r180 bottom
R113 "100k" R0402 364.17,536.42 r90 top
R114 "43.2k" R0402 305.12,487.2 r270 top
R115 "33.2k" R0402 364.17,437.99 r270 top
R117 "100k" R0402 314.96,781.5 r90 top
R118 "43.2k" R0402 295.28,683.07 r270 top
R119 "1k" R0402 295.28,584.65 r270 top
R120 "100k" R0402 521.65,899.61 r180 bottom